# Altium PCB Audio-Switch-v2.0.PcbDoc (part 1 of 3)
Units mil, origin at the board's own origin, x right, y up, seen from the top; angles counter-clockwise.
Board outline 3937.01 x 3149.61 mil, 4 copper layers (Top Layer, Ground Layer, Power Layer, Bottom Layer), stack 60.4 mil thick; 165 components, 115 nets, 627 pads, 263 vias.
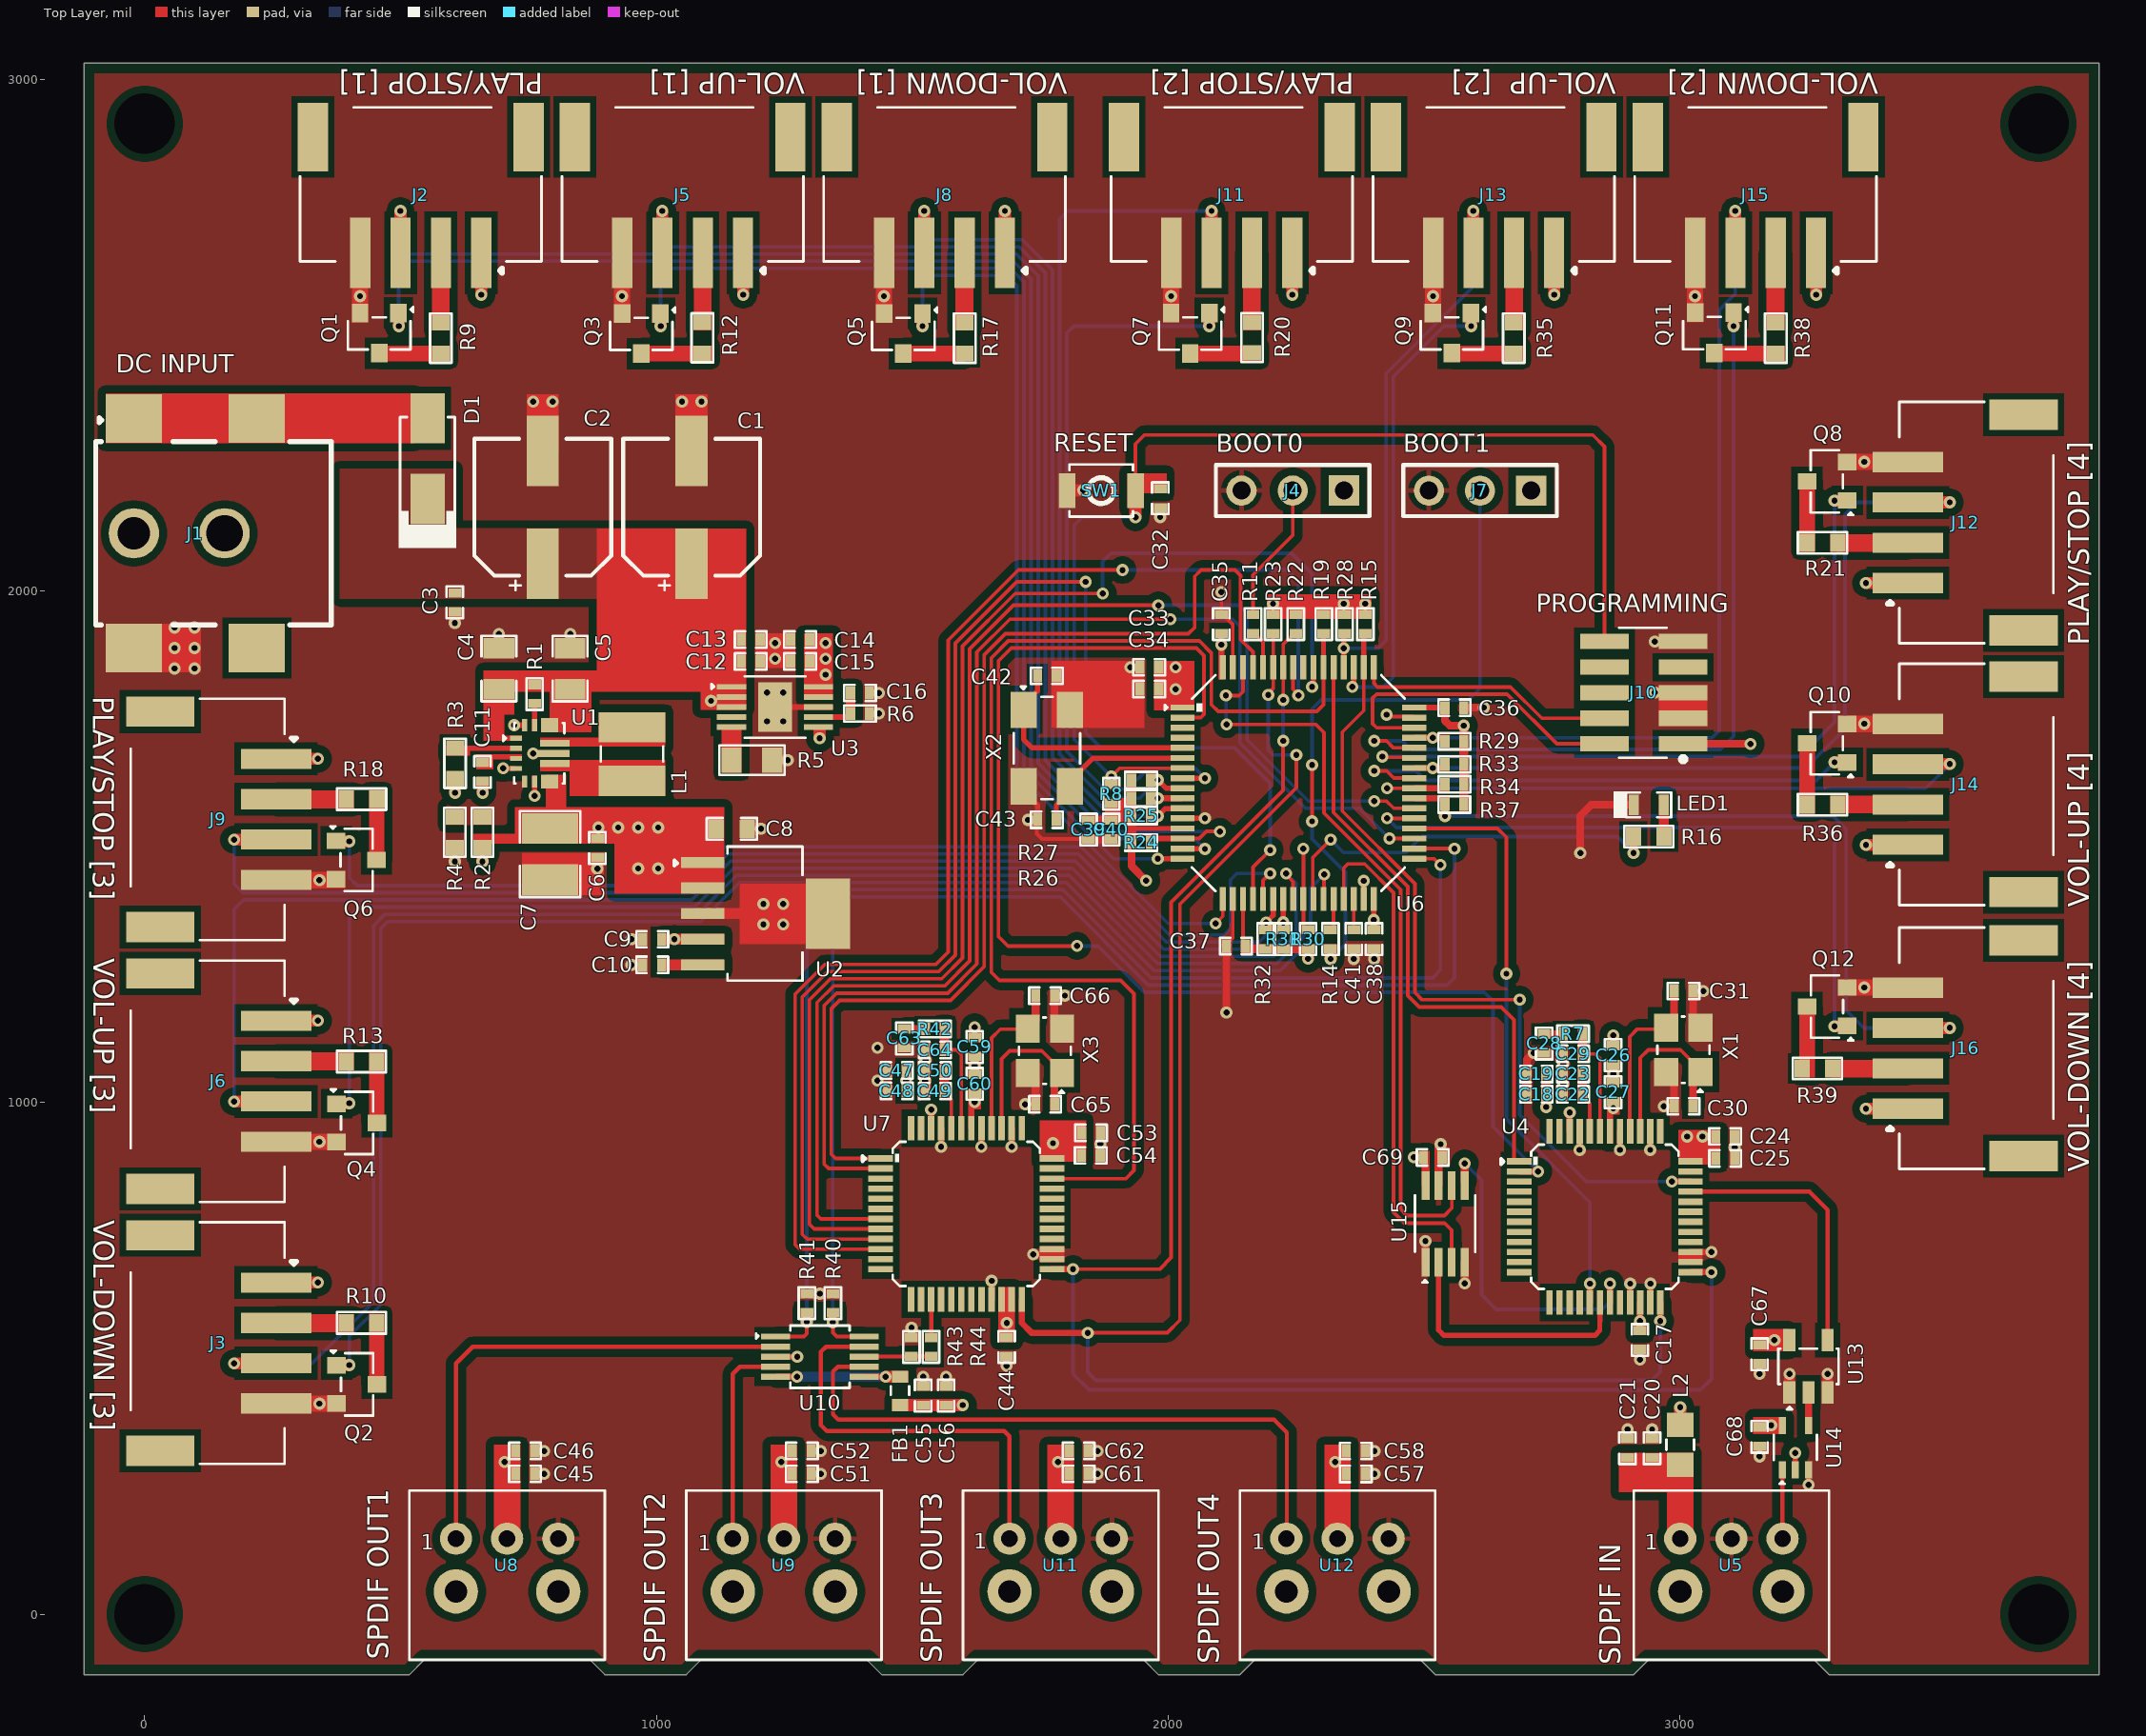
[diagram p0: Top Layer view]
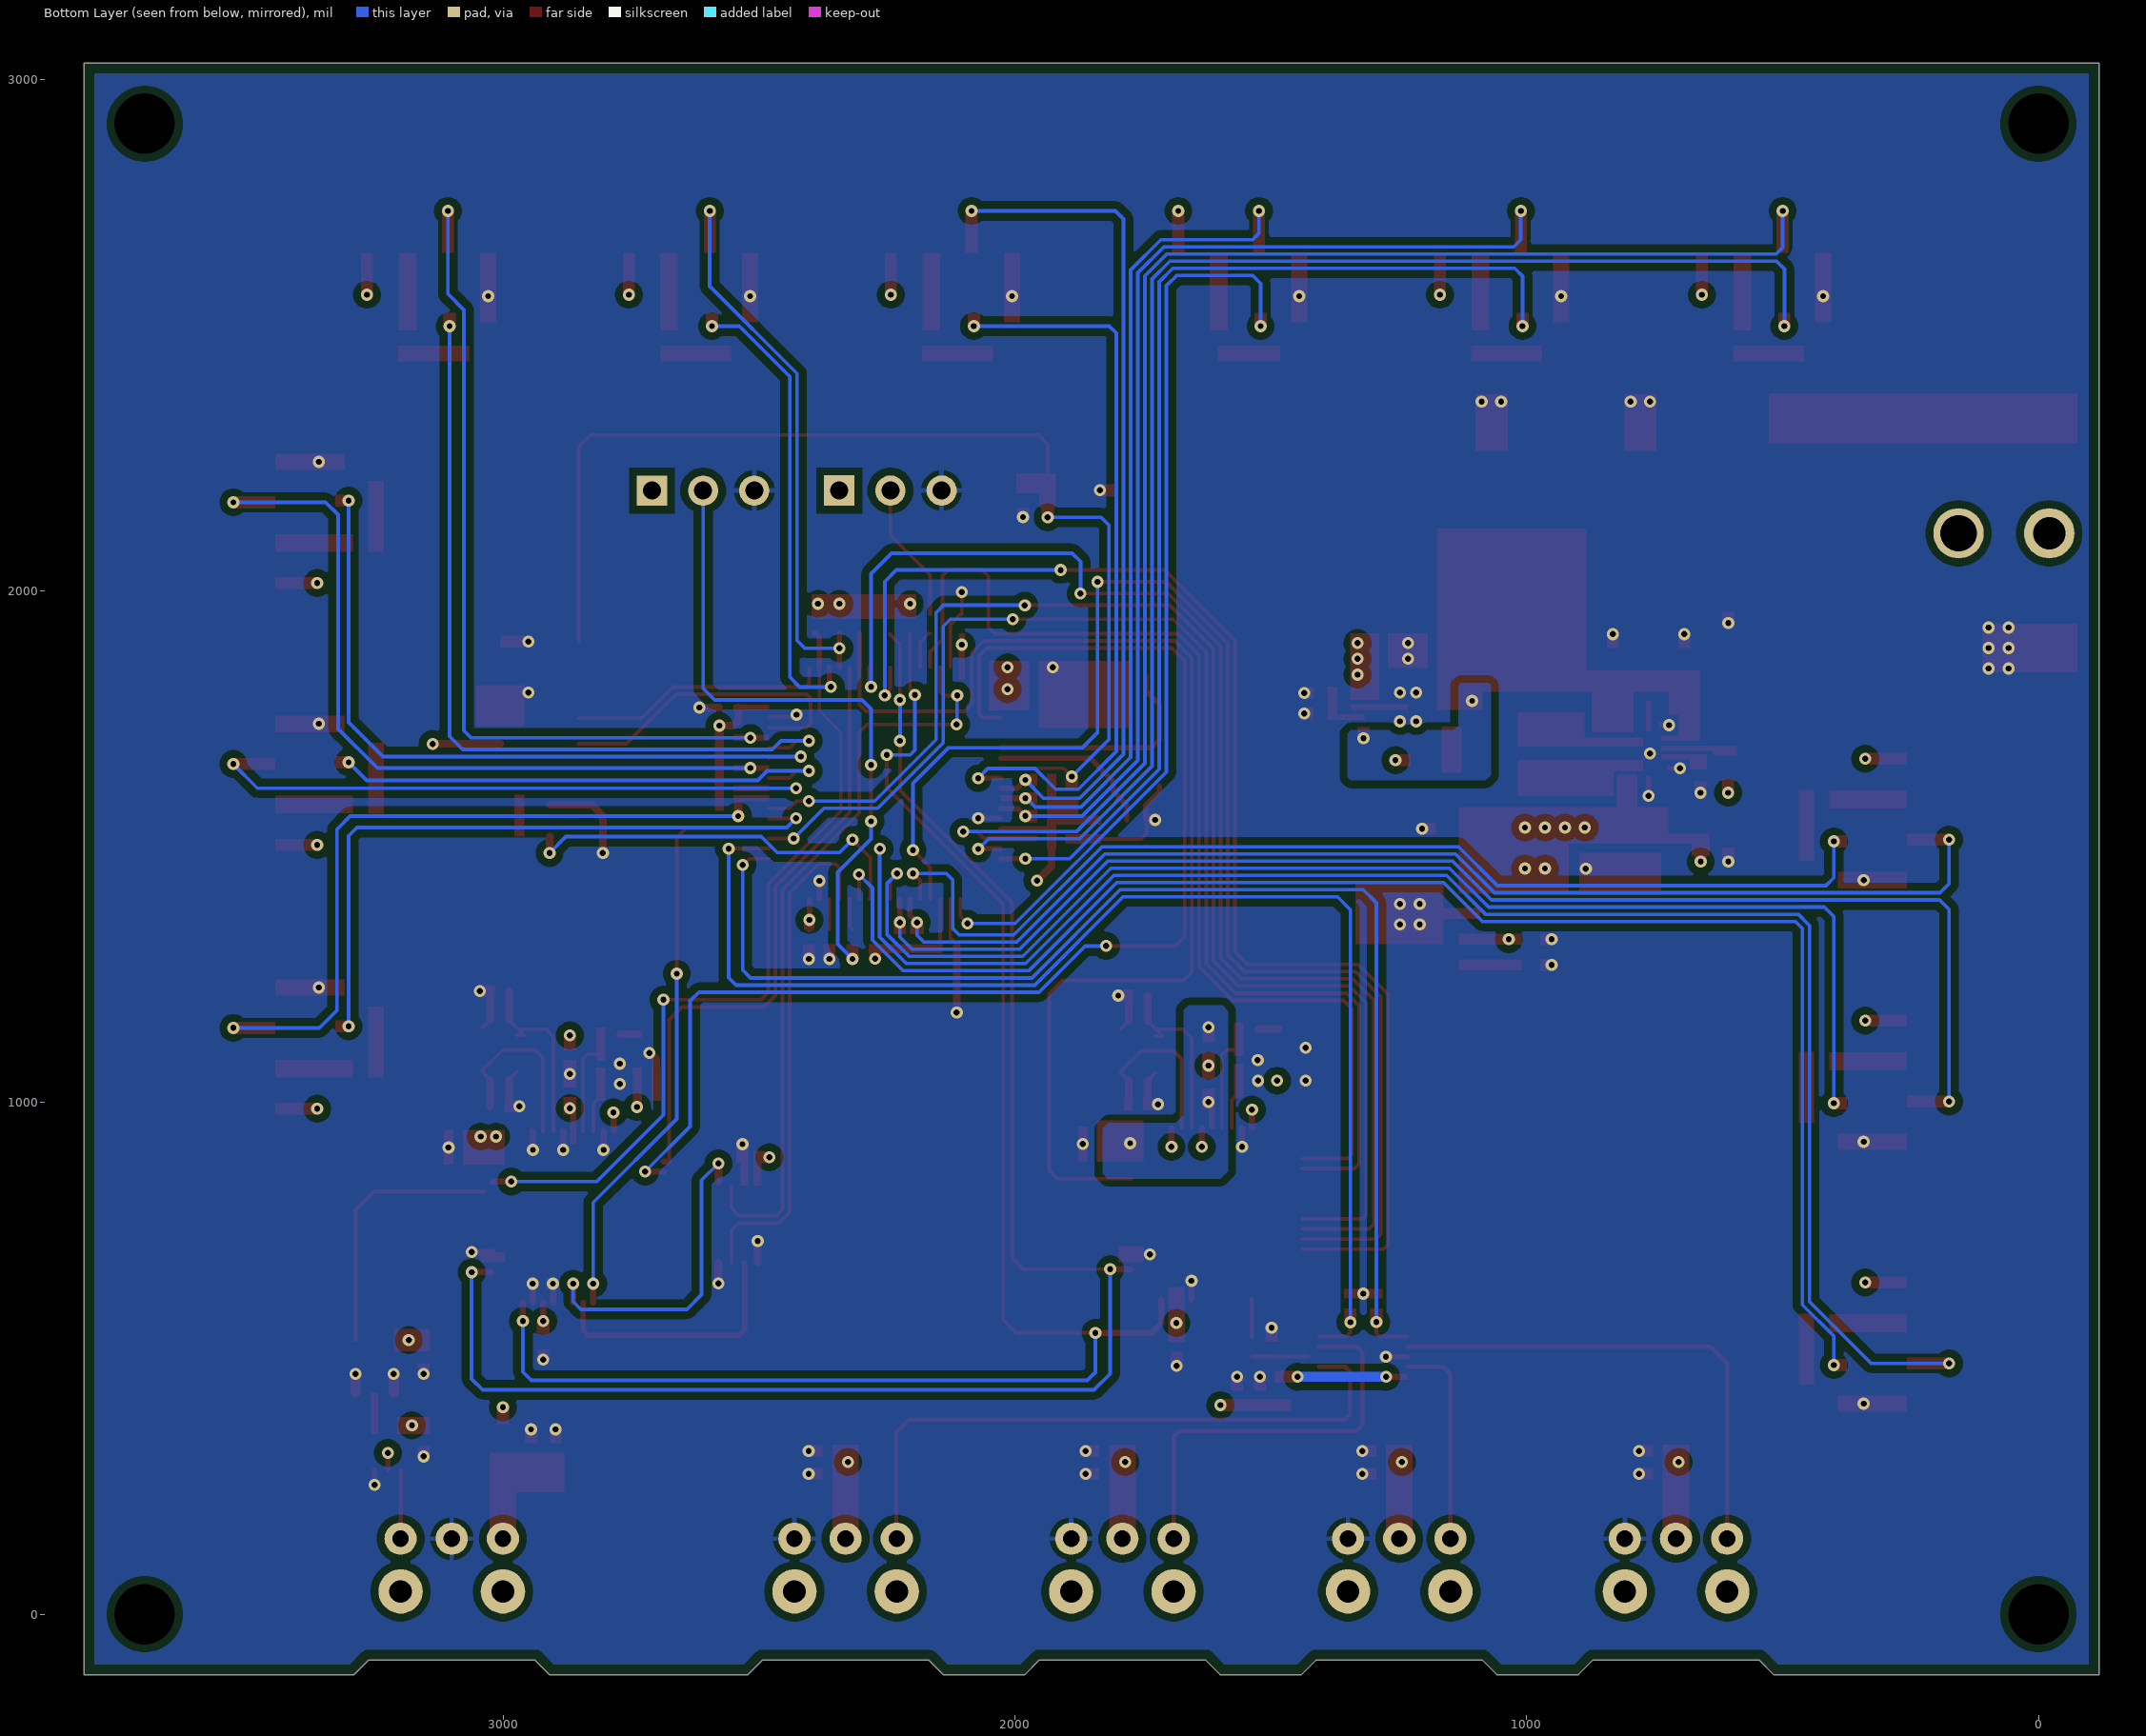
[diagram p1: Bottom Layer view, seen from below]
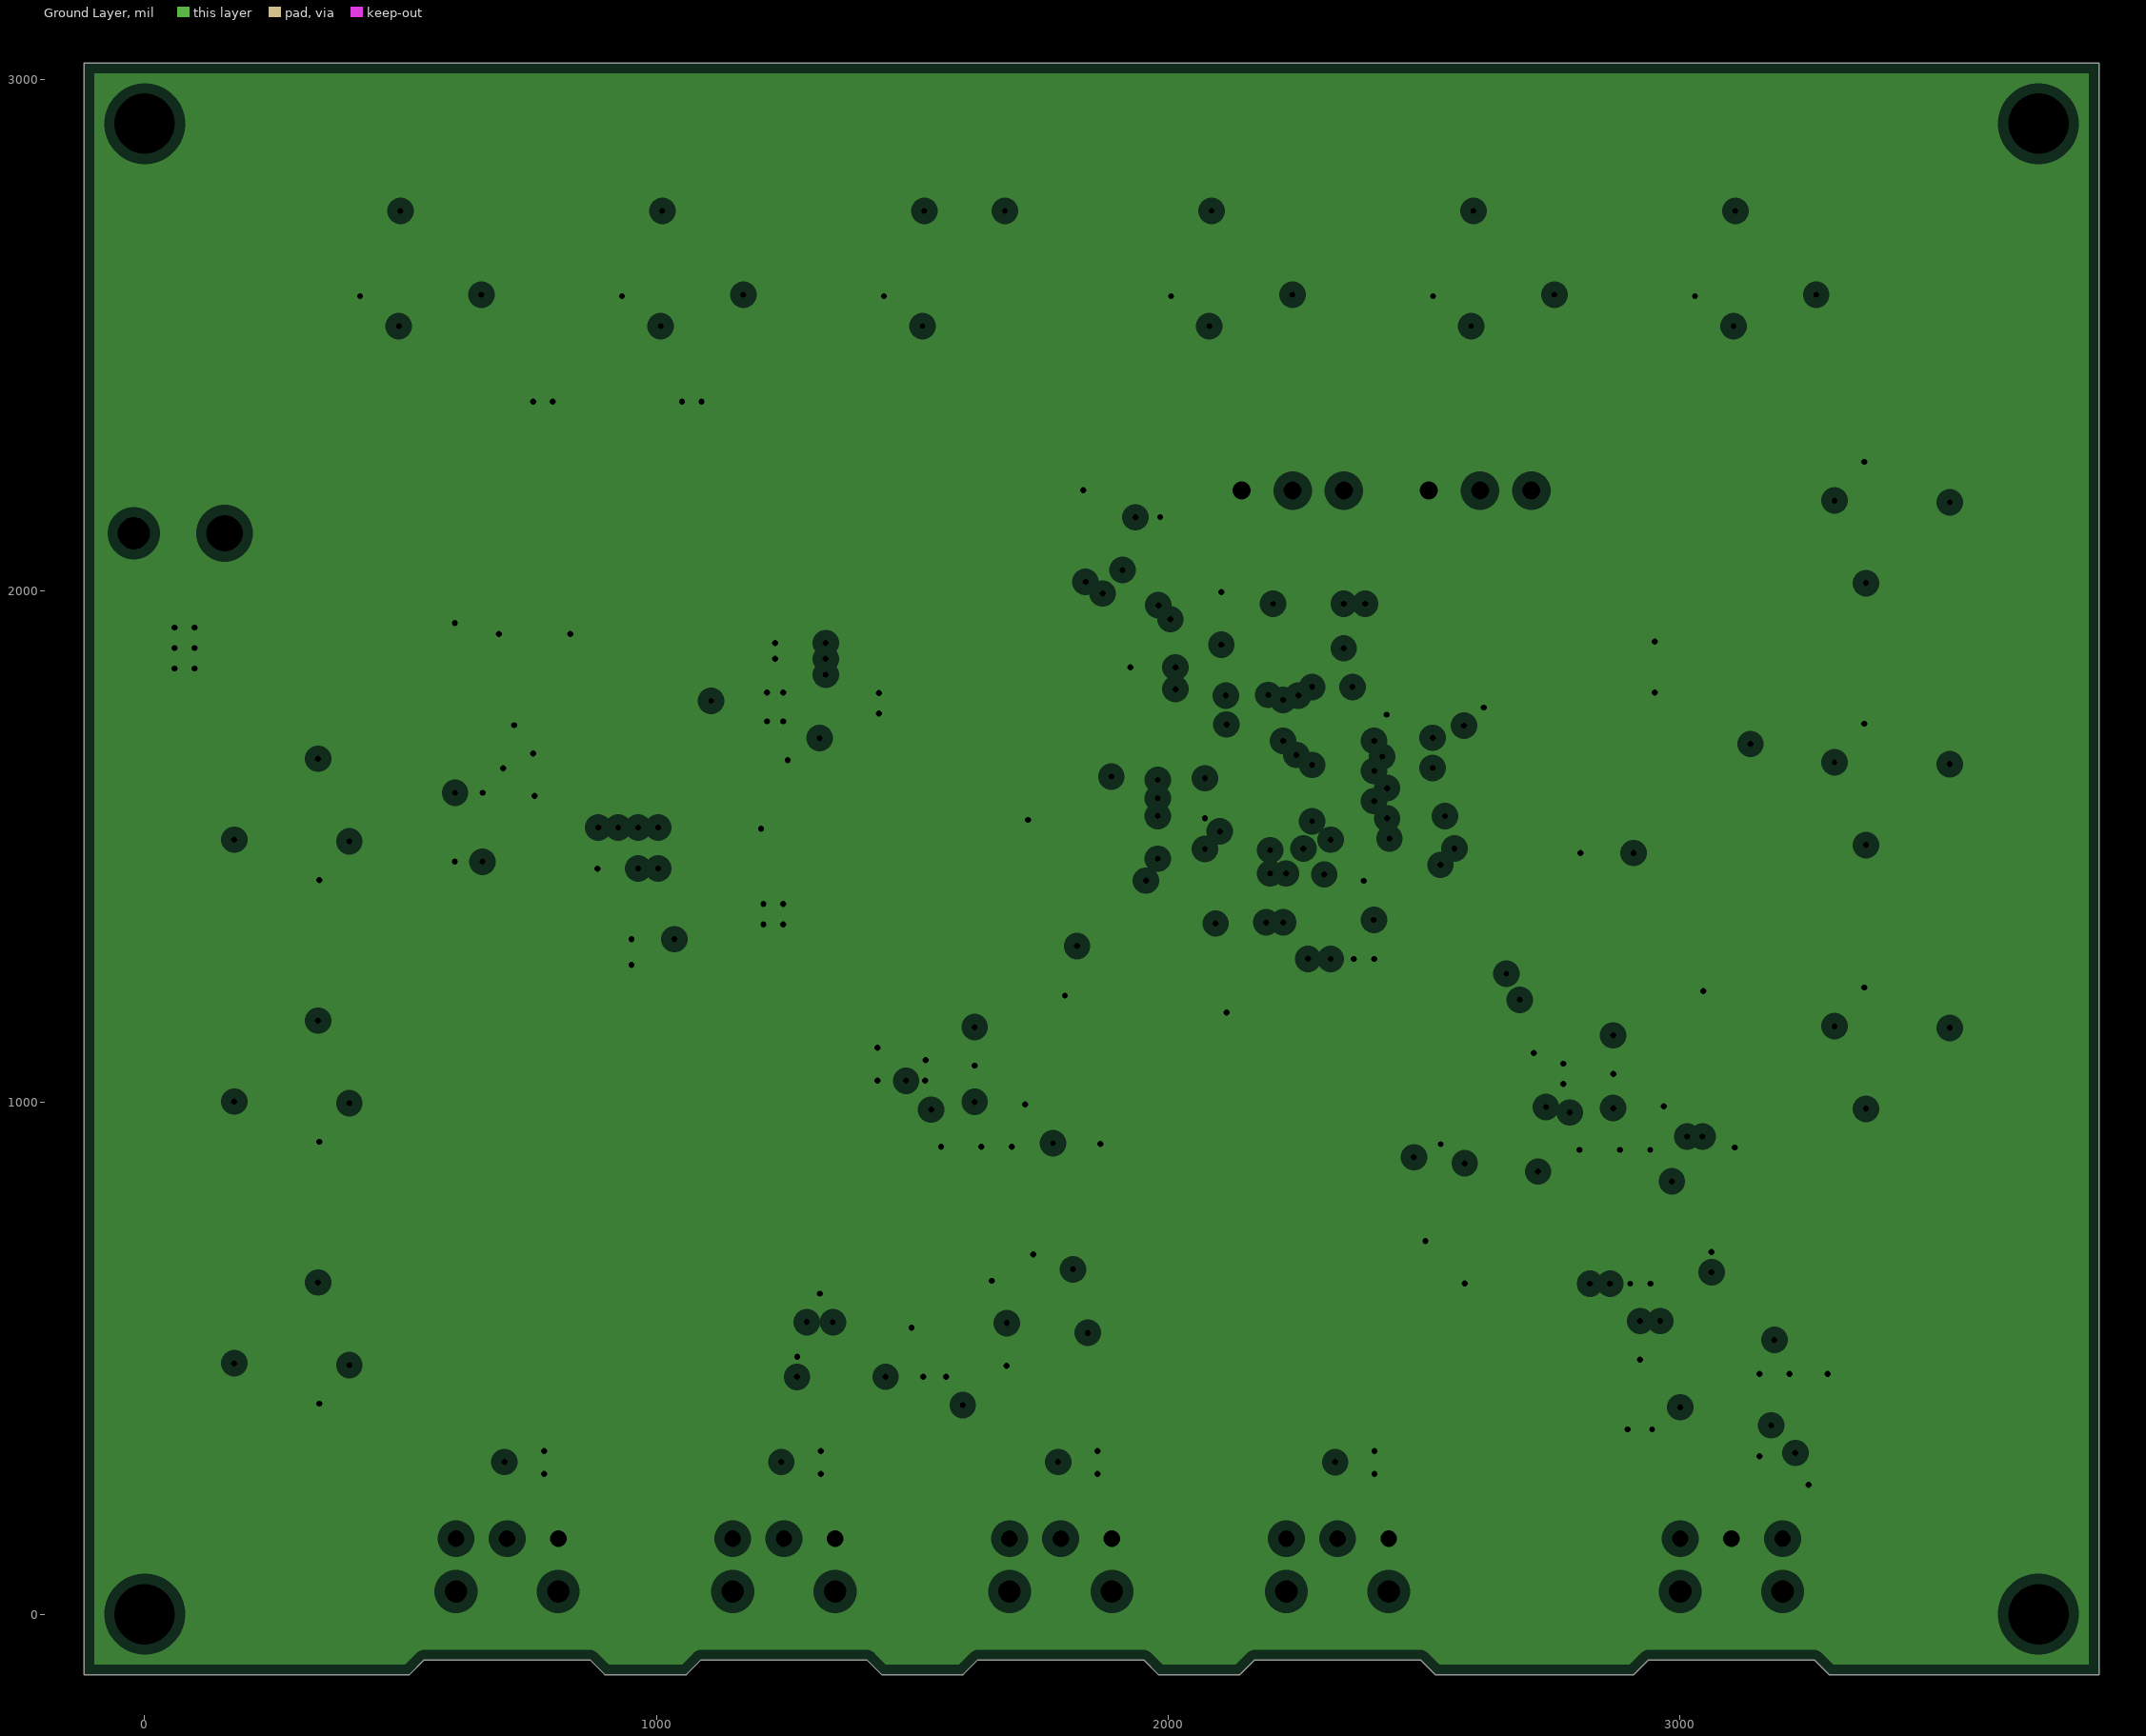
[diagram p2: Ground Layer, clearances drawn from the general rule]
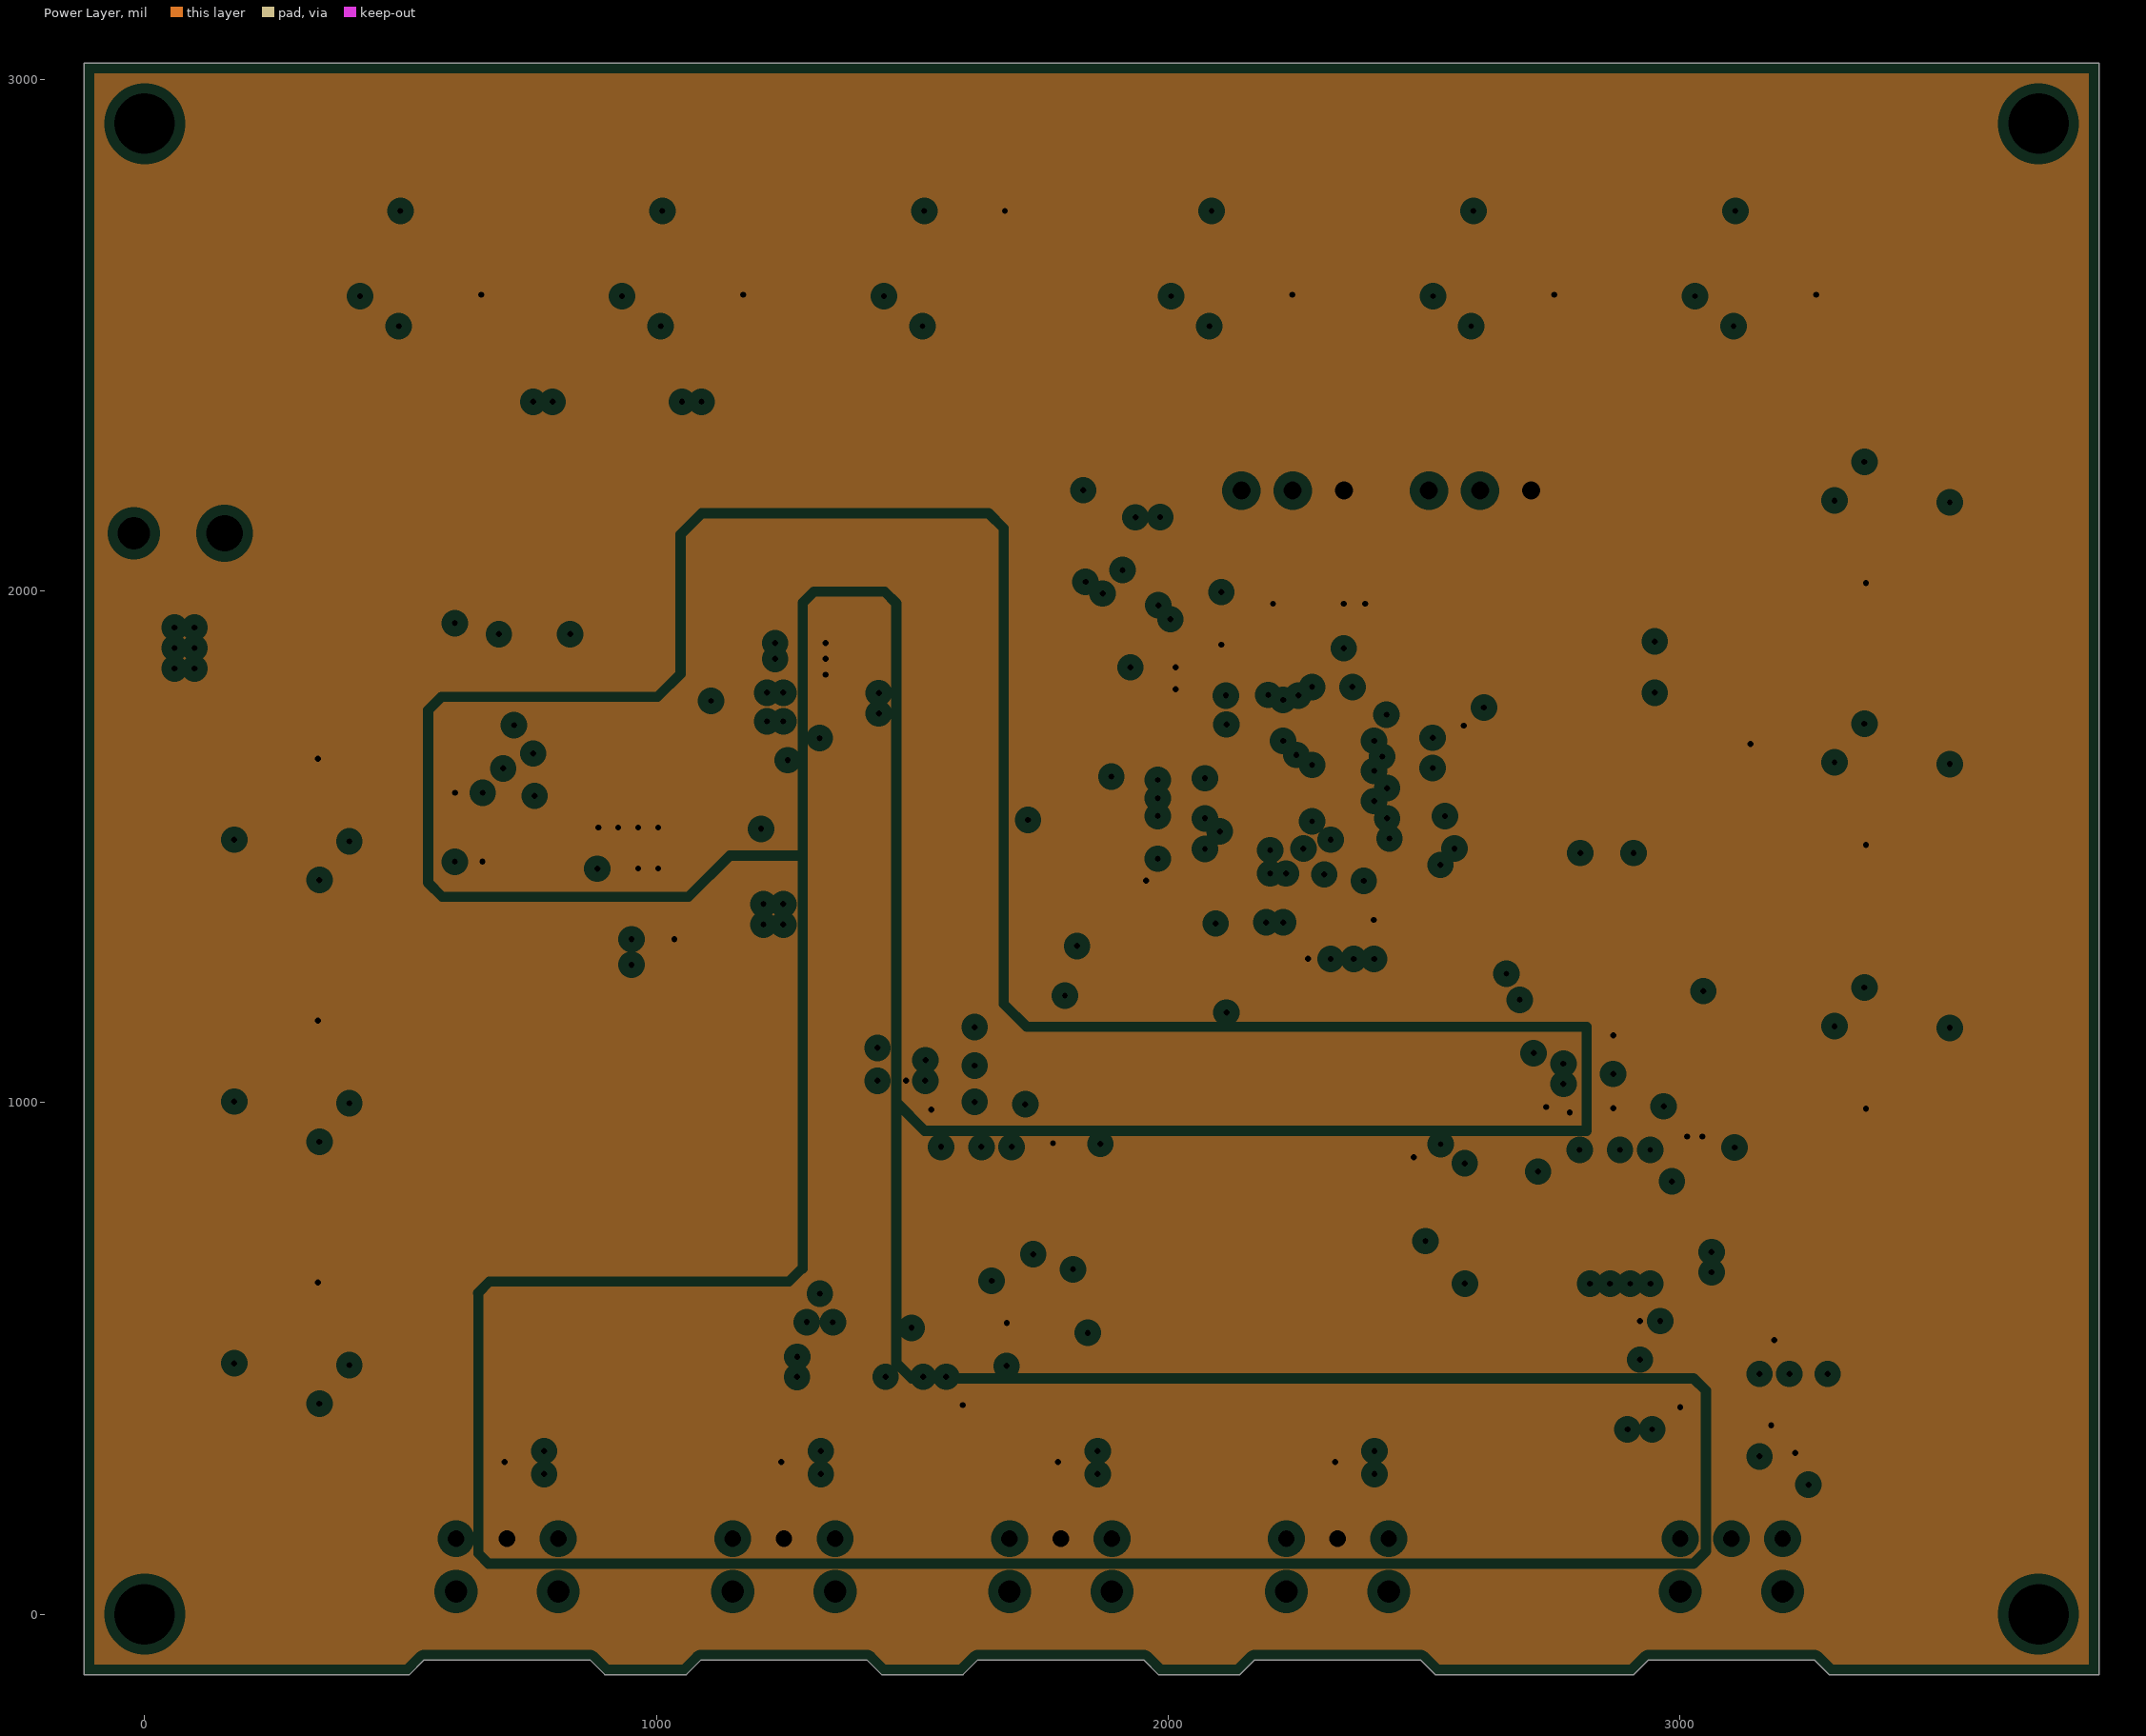
[diagram p3: Power Layer, clearances drawn from the general rule]
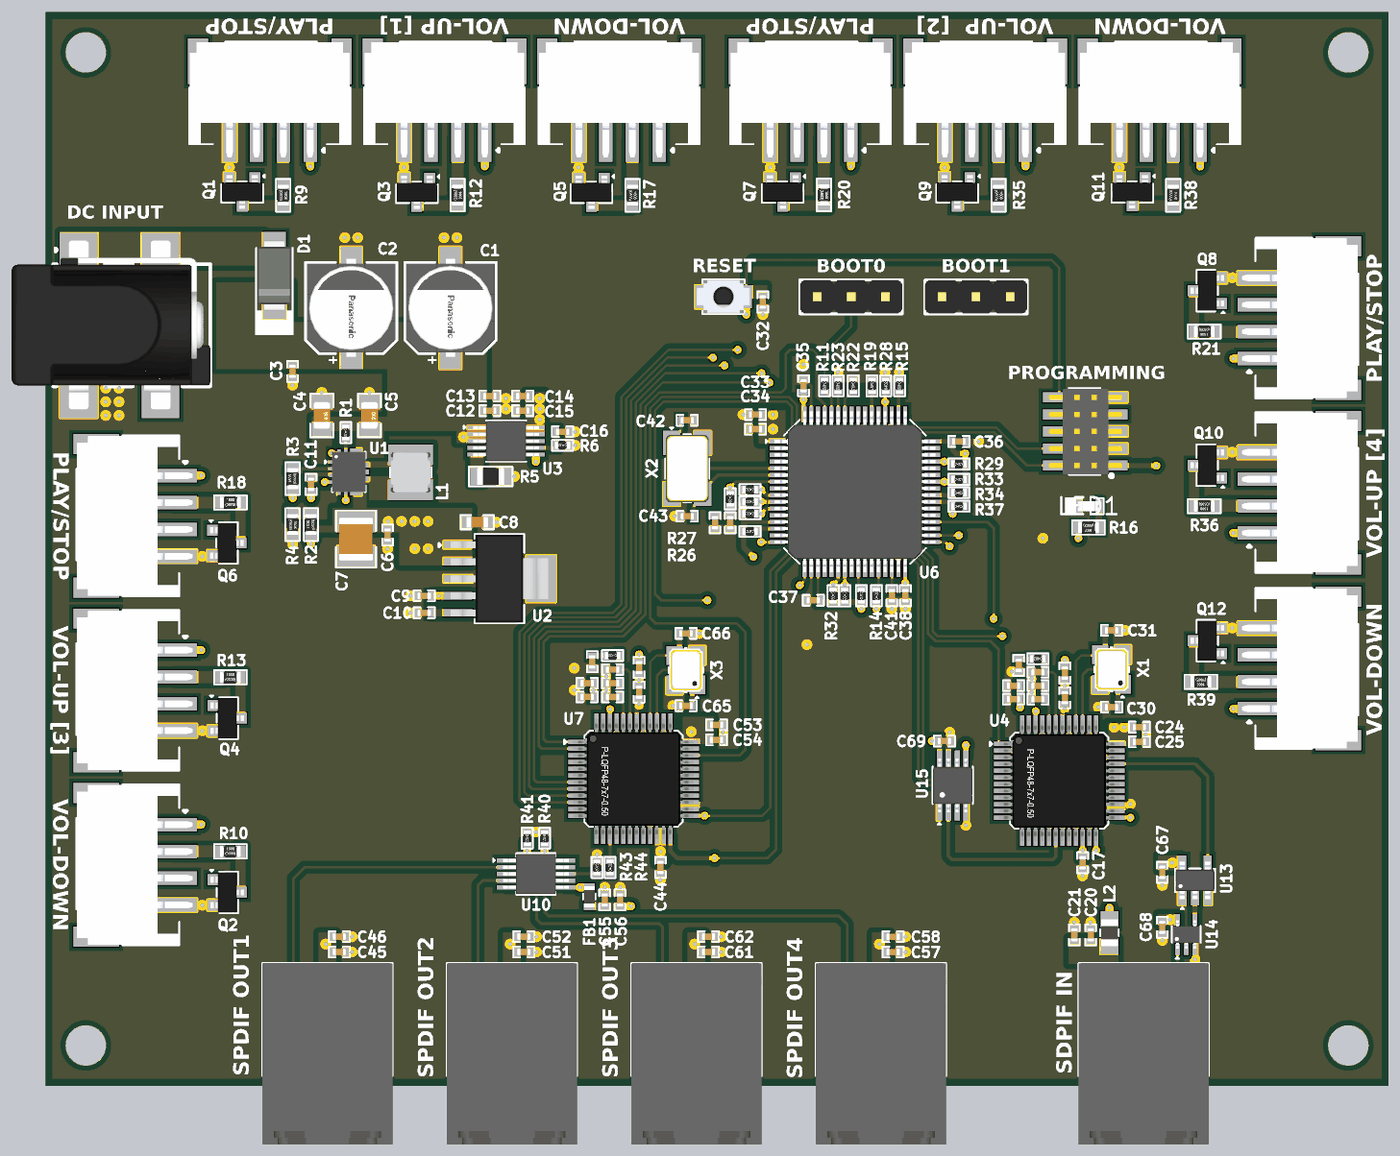
[diagram p5: 3D render of the assembled board from above, using the file's embedded part models]

## Layer stack, top to bottom
Top Solder: solder mask 0.4, Solder Resist, Dk 3.5
Top Layer: signal copper 1.38
Dielectric 2: prepreg 4.8, PP-006, Dk 4.2
Ground Layer: plane copper 1.38, net GND
Dielectric 1: dielectric 45.28, FR-4, Dk 4.2
Power Layer: plane copper 1.38, net (Multiple Nets)
Dielectric 3: prepreg 4.8, PP-006, Dk 4.2
Bottom Layer: signal copper 1.38
Bottom Solder: solder mask 0.4, Solder Resist, Dk 3.5

## Board outline
-118.11,-118.11 517.28,-118.11 517.44,-118.11 546.18,-89.38 870.28,-89.38 899.01,-118.11 1058.38,-118.11 1058.39,-118.12 1087.12,-89.38 1411.23,-89.38 1439.96,-118.12 1599.33,-118.12 1628.07,-89.38 1952.17,-89.38 1980.9,-118.11 2140.27,-118.11 2169.01,-89.38 2493.11,-89.38 2521.85,-118.11 2909.96,-118.11 2938.7,-89.38 3262.8,-89.38 3291.53,-118.11 3818.9,-118.11 3818.9,3031.5 -118.11,3031.5

## Design rules (kind name [scope] priority, off if disabled: settings)
BoardOutlineClearance [All] p1: gap=0 ignorepadtopadclearanceinfootprint=FALSE except(20: Poly-OutlineEdge)
Clearance [All] p1: gap=10 ignorepadtopadclearanceinfootprint=FALSE except(0: Arc-Hole Track-Hole SMDPad-Hole THPad-Hole Via-Hole Fill-Hole Poly-Hole Region-Hole Text-Hole; 5: Arc-SMDPad Track-SMDPad Track-Fill SMDPad-SMDPad SMDPad-Via SMDPad-Fill Via-Fill Fill-Fill; 7: Arc-Track Arc-Via Track-Track Track-Via THPad-Via Via-Via; 12: SMDPad-Poly; 15: Arc-Poly Track-Poly THPad-Poly Via-Poly Fill-Poly Poly-Poly)
HoleSize [All] p1: absolutevalues=TRUE maxlimit=157.48 minlimit=1 maxpercent=80.000 minpercent=20.000
MinimumSolderMaskSliver [All] p1: minsoldermaskwidth=0
PlaneClearance [All] p1: clearance=20
PlaneConnect [All] p1: planeconnectstyle=Direct reliefexpansion=20 reliefentries=4 reliefconductorwidth=10 reliefairgap=10
PolygonConnect [All] p1: thpad.connectstyle=Relief thpad.reliefconductorwidth=10 thpad.reliefentries=4 thpad.polygonreliefangle="90 Angle" thpad.airgapwidth=10 smdpad.connectstyle=Direct smdpad.reliefconductorwidth=10 smdpad.reliefentries=4 smdpad.polygonreliefangle="90 Angle" smdpad.airgapwidth=10 via.connectstyle=Direct via.reliefconductorwidth=10 via.reliefentries=4 via.polygonreliefangle="90 Angle" via.airgapwidth=10
RoutingVias [All] p1: holewidth=11.81 width=23.62 viastyle="Through Hole" minholewidth=11.81 minwidth=23.62 maxholewidth=11.81 maxwidth=23.62
SilkToSilkClearance [All] p1: silktosilkclearance=5
SilkToSolderMaskClearance [IsPad] p1: minsilkscreentomaskgap=0 clearancetoexposedcopper=TRUE
SolderMaskExpansion [All] p1: expansion=4 istentingtop=FALSE
Width "SPDIF TRACE" [InNetClass('SPDIF')] p1: maxlimit=8.28 minlimit=8.28 preferedwidth=8.28 impedanceprofiledriven=TRUE impedanceprofileid={E2A7A2EA-177D-466D-A185-9F03FA65F514} impedanceprofilevalue=50.000000 minimp=50.000000 maximp=50.000000 favimp=50.000000
Width [All] p2: maxlimit=20 minlimit=7 preferedwidth=15 minimp=50.000000 maximp=50.000000 favimp=50.000000
24 further rules are at their usual default settings.

## Classes and differential pairs
net class SPDIF: SPDIF-IN SPDIF-INN SPDIF-OUT SPDIF-OUT1 SPDIF-OUT2 SPDIF-OUT3 SPDIF-OUT4
component class U_SPDIF-to-I2S-Sheet: C17 C18 C19 C20 C21 C22 C23 C24 C25 C26 C27 C28 C29 C30 C31 C67 C68 C69 L2 R7 U4 U5 U13 U14 U15 X1
component class U_Power-Sheet: C1 C2 C3 C4 C5 C6 C7 C8 C9 C10 C11 C12 C13 C14 C15 C16 D1 J1 L1 R1 R2 R3 R4 R5 R6 U1 U2 U3
component class U_I2S-to-SPDIF-Sheet: C44 C45 C46 C47 C48 C49 C50 C51 C52 C53 C54 C55 C56 C57 C58 C59 C60 C61 C62 C63 C64 C65 C66 FB1 R40 R41 R42 R43 R44 U7 U8 U9 U10 U11 U12 X3
component class U_Controller-Sheet: C32 C33 C34 C35 C36 C37 C38 C39 C40 C41 C42 C43 J2 J3 J4 J5 J6 J7 J8 J9 J10 J11 J12 J13 J14 J15 J16 LED1 Q1 Q2 Q3 Q4 Q5 Q6 Q7 Q8 Q9 Q10 Q11 Q12 R8 R9 R10 R11 R12 R13 R14 R15 R16 R17 R18 R19 R20 R21 R22 R23 R24 R25 R26 R27 R28 R29 R30 R31 R32 R33 R34 R35 R36 R37 R38 R39 SW1 U6 X2

## Components (designator, comment, footprint, x,y, rotation, side; value= is the part's Value field where it differs from the comment)
C1 "47uF" 25SVPF47M 1068.83,2163.82 r90 top
C2 "47uF" 25SVPF47M 777.83,2163.82 r90 top
C3 "0.1uF" Cap-0402 606.02,1977.82 r90 top
C4 "22uF" Cap-0805 692.01,1848.43 r270 top
C5 "22uF" Cap-0805 831.51,1848.43 r270 top
C6 "10uF" Cap-0402 884.49,1497.64 r90 top
C7 "47uF" Cap-1210 792.09,1485.64 r270 top
C8 "2.2uF" CAP-0603 1147.29,1535.1 r180 top
C9 "1uF" Cap-0402 991.87,1319.34 r0 top
C10 "10nF" Cap-0402 991.87,1269.34 r0 top
C11 "0.1uF" Cap-0402 660.37,1646.3 r90 top
C12 "4.7uF" Cap-0402 1184.26,1862.34 r180 top
C13 "4.7uF" Cap-0402 1184.26,1905.17 r180 top
C14 "4.7uF" Cap-0402 1280.83,1905.16 r0 top
C15 "4.7uF" Cap-0402 1280.83,1862.34 r0 top
C16 "4.7uF" Cap-0402 1397.83,1800.53 r180 top
C17 "0.1uF" Cap-0402 2922,536 r90 top
C18 "10uF" Cap-0402 2719.6,1016.25 r0 top
C19 "0.1uF" Cap-0402 2719.6,1055.69 r0 top
C20 "10uF" Cap-0402 2945.75,324.4 r270 top
C21 "0.1uF" Cap-0402 2897.75,324.4 r270 top
C22 "10uF" Cap-0402 2791,1016.25 r0 top
C23 "0.1uF" Cap-0402 2791,1055.69 r0 top
C24 "10uF" Cap-0402 3088.5,934 r180 top
C25 "0.1uF" Cap-0402 3088.51,891 r180 top
C26 "10uF" Cap-0402 2869.74,1092.74 r90 top
C27 "0.1uF" Cap-0402 2869.74,1020.25 r270 top
C28 "68nF" Cap-0402 2734.6,1115.24 r270 top
C29 "4.7nF" Cap-0402 2791,1095.24 r180 top
C30 "18pF" Cap-0402 3007.1,992.75 r0 top
C31 "18pF" Cap-0402 3007.11,1218 r180 top
C32 "0.1uF" Cap-0402 1984.49,2181.25 r90 top
C33 "1uF" Cap-0402 1963.12,1850.82 r0 top
C34 "0.1uF" Cap-0402 1963.12,1808.2 r0 top
C35 "0.1uF" Cap-0402 2103.85,1935.45 r270 top
C36 "0.1uF" Cap-0402 2559.49,1772.08 r180 top
C37 "0.1uF" Cap-0402 2132.44,1306.09 r0 top
C38 "0.1uF" Cap-0402 2402.49,1319.45 r90 top
C39 "1uF" Cap-0402 1844.49,1533.68 r90 top
C40 "0.1uF" Cap-0402 1888.99,1533.68 r90 top
C41 "4.7uF" Cap-0402 2362.76,1319.46 r90 top
C42 "30pF" Cap-0402 1762.99,1834.03 r180 top
C43 "30pF" Cap-0402 1763,1552.69 r0 top
C44 "0.1uF" Cap-0402 1684.59,522.48 r90 top
C45 "0.1uF" Cap-0402 743.24,274.25 r180 top
C46 "10uF" Cap-0402 743.24,319.25 r180 top
C47 "10uF" Cap-0402 1469.69,1062.67 r0 top
C48 "0.1uF" Cap-0402 1469.69,1022.68 r0 top
C49 "10uF" Cap-0402 1544.18,1022.49 r0 top
C50 "0.1uF" Cap-0402 1544.2,1062.67 r0 top
C51 "0.1uF" Cap-0402 1284.18,274.24 r180 top
C52 "10uF" Cap-0402 1284.18,319.24 r180 top
C53 "10uF" Cap-0402 1849.21,940.8 r180 top
C54 "0.1uF" Cap-0402 1848.69,896.76 r180 top
C55 "0.1uF" Cap-0402 1521,427 r270 top
C56 "10uF" Cap-0402 1566,426.99 r270 top
C57 "0.1uF" Cap-0402 2366.5,274 r180 top
C58 "10uF" Cap-0402 2366.5,319 r180 top
C59 "10uF" Cap-0402 1621.84,1108.7 r90 top
C60 "0.1uF" Cap-0402 1621.84,1036.68 r270 top
C61 "0.1uF" Cap-0402 1825.13,274.25 r180 top
C62 "10uF" Cap-0402 1825.13,319.25 r180 top
C63 "68nF" Cap-0402 1484.41,1125.44 r270 top
C64 "4.7nF" Cap-0402 1544.2,1103 r180 top
C65 "18pF" Cap-0402 1759.5,996.75 r0 top
C66 "18pF" Cap-0402 1759.5,1209 r180 top
C67 "0.1uF" Cap-0402 3155.75,508.08 r90 top
C68 "0.1uF" Cap-0402 3155.75,346.74 r90 top
C69 "0.1uF" Cap-0402 2517,893 r180 top
D1 "SS16" SMA 552.57,2258.82 r90 top
FB1 "BLM18SG121TN1D" "IND-0603 (1608 Metric)" 1476,436.44 r90 top
J1 "DC-005-5A-2.5-SMT" DC-005-5A-2.5-SMT -21.17,2112.82 r0 top value=Custom
J2 "S4B-PH-SM4-TB(LF)(SN)" S4B-PH-SM4-TB(LF)(SN) 539.49,2774.19 r0 top
J3 "S4B-PH-SM4-TB(LF)(SN)" S4B-PH-SM4-TB(LF)(SN) 143.54,530 r90 top
J4 "X6511WV-03H-C60D30" HDR1X3_ 2343.49,2196.45 r180 top
J5 "S4B-PH-SM4-TB(LF)(SN)" S4B-PH-SM4-TB(LF)(SN) 1051.3,2774.19 r0 top
J6 "S4B-PH-SM4-TB(LF)(SN)" S4B-PH-SM4-TB(LF)(SN) 143.54,1041.81 r90 top
J7 "X6511WV-03H-C60D30" HDR1X3_ 2709.49,2196.25 r180 top
J8 "S4B-PH-SM4-TB(LF)(SN)" S4B-PH-SM4-TB(LF)(SN) 1563.11,2774.19 r0 top
J9 "S4B-PH-SM4-TB(LF)(SN)" S4B-PH-SM4-TB(LF)(SN) 143.54,1553.62 r90 top
J10 "20021121-00010C4LF" 20021121-00010C4LF_ 2929.49,1801.25 r90 top
J11 "S4B-PH-SM4-TB(LF)(SN)" S4B-PH-SM4-TB(LF)(SN) 2124.49,2774.19 r0 top
J12 "S4B-PH-SM4-TB(LF)(SN)" S4B-PH-SM4-TB(LF)(SN) 3558.75,2133.77 r270 top
J13 "S4B-PH-SM4-TB(LF)(SN)" S4B-PH-SM4-TB(LF)(SN) 2636.3,2774.19 r0 top
J14 "S4B-PH-SM4-TB(LF)(SN)" S4B-PH-SM4-TB(LF)(SN) 3558.75,1621.96 r270 top
J15 "S4B-PH-SM4-TB(LF)(SN)" S4B-PH-SM4-TB(LF)(SN) 3148.11,2774.19 r0 top
J16 "S4B-PH-SM4-TB(LF)(SN)" S4B-PH-SM4-TB(LF)(SN) 3558.75,1106.29 r270 top
L1 "1.5uH" LVT303012-1R5M-N 952.01,1681.34 r90 top
L2 "47uH" Ind-0805 3000.75,331.06 r270 top
LED1 "RED" LED-0603 2939.17,1581.93 r180 top
Q1 "DDTD113ZC-7-F" SOT-23 458.34,2504.19 r180 top
Q2 "DDTD113ZC-7-F" SOT-23 414.54,449.25 r270 top
Q3 "DDTD113ZC-7-F" SOT-23 970.49,2503.19 r180 top
Q4 "DDTD113ZC-7-F" SOT-23 414.54,960.25 r270 top
Q5 "DDTD113ZC-7-F" SOT-23 1482.49,2503.19 r180 top
Q6 "DDTD113ZC-7-F" SOT-23 413.54,1474.25 r270 top
Q7 "DDTD113ZC-7-F" SOT-23 2043.09,2503.82 r180 top
Q8 "DDTD113ZC-7-F" SOT-23 3287.75,2214.4 r90 top
Q9 "DDTD113ZC-7-F" SOT-23 2554.49,2504.19 r180 top
Q10 "DDTD113ZC-7-F" SOT-23 3287.75,1702.4 r90 top
Q11 "DDTD113ZC-7-F" SOT-23 3067.49,2504.56 r180 top
Q12 "DDTD113ZC-7-F" SOT-23 3288,1187.65 r90 top
R1 "10K" Res-0402 762.01,1798.43 r270 top
R2 "523K" Res-0603 660.01,1528.14 r270 top value=523kR
R3 "100K" Res-0603 606.49,1662.96 r270 top
R4 "100K" Res-0603 606.13,1528.15 r90 top
R5 "649R" RES-0805 1186.79,1669.34 r0 top
R6 "49.9K" Res-0402 1397.83,1760.65 r180 top value=49.9kR
R7 "680R" Res-0402 2791,1134.5 r180 top
R8 "10K" Res-0402 1888.99,1603.51 r270 top
R9 "100R" Res-0603 578.49,2494.19 r90 top
R10 "100R" Res-0603 423.54,569.37 r180 top
R11 "10K" Res-0402 2165.91,1935.45 r270 top
R12 "100R" Res-0603 1089.67,2494.82 r90 top
R13 "100R" Res-0603 423.54,1080.25 r180 top
R14 "10K" Res-0402 2317.48,1319.47 r90 top
R15 "10K" Res-0402 2385.44,1935.45 r270 top
R16 "220R" Res-0603 2939.17,1519.79 r0 top
R17 "100R" Res-0603 1602.49,2494.19 r90 top
R18 "100R" Res-0603 423.91,1592.99 r180 top
R19 "10K" Res-0402 2304.49,1935.45 r270 top
R20 "100R" Res-0603 2163.86,2495.45 r90 top
R21 "100R" Res-0603 3278.75,2094.4 r0 top
R22 "4.7K" Res-0402 2249.65,1935.45 r270 top
R23 "4.7K" Res-0402 2205.28,1935.45 r270 top
R24 "10K" Res-0402 1947.22,1508.18 r180 top
R25 "10K" Res-0402 1947.22,1560.16 r180 top
R26 "10K" Res-0402 1947.22,1595.01 r180 top
R27 "10K" Res-0402 1947.22,1630.6 r180 top
R28 "10K" Res-0402 2344.85,1935.45 r90 top
R29 "10K" Res-0402 2559.49,1706.12 r0 top
R30 "10K" Res-0402 2273.33,1319.46 r270 top
R31 "10K" Res-0402 2224.96,1319.46 r270 top
R32 "10K" Res-0402 2190.59,1319.47 r270 top
R33 "10K" Res-0402 2559.49,1660.97 r0 top
R34 "10K" Res-0402 2559.49,1622 r0 top
R35 "100R" Res-0603 2675.49,2494.19 r90 top
R36 "100R" Res-0603 3278.75,1582.4 r0 top
R37 "10K" Res-0402 2559.48,1582.42 r0 top
R38 "100R" Res-0603 3187.48,2494.19 r90 top
R39 "100R" Res-0603 3268.75,1066.92 r0 top
R40 "10K" Res-0402 1345,607.82 r270 top
R41 "10K" Res-0402 1294,608 r270 top
R42 "680R" Res-0402 1544.2,1143.94 r180 top
R43 "10K" Res-0402 1498.43,522.49 r270 top
R44 "33R" Res-0402 1536.7,522.49 r90 top
SW1 "B3U-1000P" B3U-1000P 1869.25,2196.25 r180 top
U1 "TPS63070RNMR" VQFN-15-HR(2.5x3) 763.49,1682.64 r0 top locked
U2 "TPS79633DCQR" SOT-223-6_ 1212.87,1369.34 r270 top
U3 "LT3042IMSE#PBF" 10-MSOP-EP 1231.83,1773.34 r0 top
U4 "PCM9211PTR" "48-LQFP (7x7)" 2853.6,776.75 r0 top
U5 "PLR237/T10BK" PLR237/T10BK 3100.75,95.97 r180 top
U6 "STM32F401RCT6" "64-LQFP (10x10)" 2254.49,1624.45 r0 top locked
U7 "PCM9211PTR" "48-LQFP (7x7)" 1605.7,782.49 r0 top
U8 "PLT133/T10W" PLT133/T10W 708.23,95.98 r180 top
U9 "PLT133/T10W" PLT133/T10W 1249.17,95.97 r180 top
U10 "TMUX1204DGSR" VSSOP-10 1319.49,503.29 r0 top
U11 "PLT133/T10W" PLT133/T10W 1790.12,95.98 r180 top
U12 "PLT133/T10W" PLT133/T10W 2331.06,95.97 r180 top
U13 "SN74LVC1G125DBVR" SOT-23-5 3251.34,484.4 r90 top
U14 "SN74LVC1G08DCKR" SC70-5 3225.75,325.4 r90 top
U15 "SN74LVC2G125DCTR" SM8 2541.25,762.6 r90 top
X1 "S3224576121060" S3224576121060_ 3007.1,1103.24 r90 top value=24.576MHz
X2 "8MHz" 5TJ480000XYLBC_ 1762.99,1693.03 r270 top
X3 "S3224576121060" S3224576121060_ 1759.19,1101.24 r90 top value=24.576MHz

## Footprints (in the part's own frame and the unit in brackets; to place one, negate y for a bottom-side part, rotate by r counter-clockwise, add the part's x,y. Pads: shape width x height; smd on the part's side, far side on the other; paste and mask are expansions set on the pad)
5TJ480000XYLBC_ [mm]
  rect 1.8x1.3 smd mask+0.07: 1(-1.9,-1.15) 2(1.9,-1.15) 3(1.9,1.15) 4(-1.9,1.15)
  silkscreen extent -3.05,-1.65 2.54,1.65, body extent -2.5,-1.6 2.5,1.6, height 1
10-MSOP-EP [mm]
  rect 1.45x0.28 smd mask+0.08: 1(-2.16,1) 2(-2.16,0.5) 3(-2.16,0) 4(-2.16,-0.5) 5(-2.16,-1) 6(2.16,-1) 7(2.16,-0.5) 8(2.16,0) 9(2.16,0.5) 10(2.16,1)
  rect 1.68x2.46 smd paste-2 mask+0.08: 11(0,0)
  silkscreen extent -3.15,-1.52 1.5,1.52, body extent -2.45,-1.5 2.45,1.5, height 1.07
25SVPF47M [mm]
  rect 3.5x1.6 smd: 1(-2.8,0) 2(2.8,0)
  silkscreen extent -4.11,-3.4 3.4,3.4, body extent -3.65,-3.3 3.65,3.3, height 6
"48-LQFP (7x7)" [mm]
  rect 1.22x0.32 smd: 1(-4.25,2.75) 2(-4.25,2.25) 3(-4.25,1.75) 4(-4.25,1.25) 5(-4.25,0.75) 6(-4.25,0.25) 7(-4.25,-0.25) 8(-4.25,-0.75) 9(-4.25,-1.25) 10(-4.25,-1.75) 11(-4.25,-2.25) 12(-4.25,-2.75) 25(4.25,-2.75) 26(4.25,-2.25) 27(4.25,-1.75) 28(4.25,-1.25) 29(4.25,-0.75) 30(4.25,-0.25) 31(4.25,0.25) 32(4.25,0.75) 33(4.25,1.25) 34(4.25,1.75) 35(4.25,2.25) 36(4.25,2.75)
  rect 0.32x1.22 smd: 13(-2.75,-4.25) 14(-2.25,-4.25) 15(-1.75,-4.25) 16(-1.25,-4.25) 17(-0.75,-4.25) 18(-0.25,-4.25) 19(0.25,-4.25) 20(0.75,-4.25) 21(1.25,-4.25) 22(1.75,-4.25) 23(2.25,-4.25) 24(2.75,-4.25) 37(2.75,4.25) 38(2.25,4.25) 39(1.75,4.25) 40(1.25,4.25) 41(0.75,4.25) 42(0.25,4.25) 43(-0.25,4.25) 44(-0.75,4.25) 45(-1.25,4.25) 46(-1.75,4.25) 47(-2.25,4.25) 48(-2.75,4.25)
  silkscreen extent -5.16,-3.58 3.66,3.58, body extent -4.51,-4.51 4.49,4.49, height 1.43
"64-LQFP (10x10)" [mm]
  rect 1.2x0.3 smd: 1(-5.75,3.75) 2(-5.75,3.25) 3(-5.75,2.75) 4(-5.75,2.25) 5(-5.75,1.75) 6(-5.75,1.25) 7(-5.75,0.75) 8(-5.75,0.25) 9(-5.75,-0.25) 10(-5.75,-0.75) 11(-5.75,-1.25) 12(-5.75,-1.75) 13(-5.75,-2.25) 14(-5.75,-2.75) 15(-5.75,-3.25) 16(-5.75,-3.75) 33(5.75,-3.75) 34(5.75,-3.25) 35(5.75,-2.75) 36(5.75,-2.25) 37(5.75,-1.75) 38(5.75,-1.25) 39(5.75,-0.75) 40(5.75,-0.25) 41(5.75,0.25) 42(5.75,0.75) 43(5.75,1.25) 44(5.75,1.75) 45(5.75,2.25) 46(5.75,2.75) 47(5.75,3.25) 48(5.75,3.75)
  rect 0.3x1.2 smd: 17(-3.75,-5.75) 18(-3.25,-5.75) 19(-2.75,-5.75) 20(-2.25,-5.75) 21(-1.75,-5.75) 22(-1.25,-5.75) 23(-0.75,-5.75) 24(-0.25,-5.75) 25(0.25,-5.75) 26(0.75,-5.75) 27(1.25,-5.75) 28(1.75,-5.75) 29(2.25,-5.75) 30(2.75,-5.75) 31(3.25,-5.75) 32(3.75,-5.75) 49(3.75,5.75) 50(3.25,5.75) 51(2.75,5.75) 52(2.25,5.75) 53(1.75,5.75) 54(1.25,5.75) 55(0.75,5.75) 56(0.25,5.75) 57(-0.25,5.75) 58(-0.75,5.75) 59(-1.25,5.75) 60(-1.75,5.75) 61(-2.25,5.75) 62(-2.75,5.75) 63(-3.25,5.75) 64(-3.75,5.75)
  silkscreen extent -6.63,-5.36 5.28,5.36, body extent -6,-6 6,6, height 1.6
20021121-00010C4LF_ [mm]
  rect 0.76x2.4 smd: 1(-2.54,-1.95) 2(-2.54,1.95) 3(-1.27,-1.95) 4(-1.27,1.95) 5(0,-1.95) 6(0,1.95) 7(1.27,-1.95) 8(1.27,1.95) 9(2.54,-1.95) 10(2.54,1.95)
  silkscreen extent -3.43,-2.08 3.23,1.22, body extent -3.17,-2.78 3.18,2.72, height 4.5
B3U-1000P [mm] "SWITCH TACTILE SPST-NO 0.05A 12V"
  rect 0.82x1.72 smd: 1(-1.7,0) 2(1.7,0)
  silkscreen extent -1.57,-1.3 1.57,1.3, body extent -2,-1.26 2,1.24, height 1.6
Cap-0402 [mil]
  rect 18x25 smd mask+2.36: 1(-18.5,0) 2(18.5,0)
  silkscreen extent -31,-16 31,16, body extent -20,-10 20,10, height 19
CAP-0603 [mil]
  rect 30x35 smd mask+2.36: 1(-30,0) 2(30,0)
  silkscreen extent -49,-21 49,21, body extent -32,-16 31,16, height 34
Cap-0805 [mil] "SMD 0805"
  rect 40x60 smd mask+2.76: 1(-40,0) 2(40,0)
  silkscreen extent -64,-34 64,34, body extent -39,-25 39,25, height 30
Cap-1210 [mil] "SMD 1210"
  rect 60x110 smd: 1(-50,0) 2(50,0)
  silkscreen extent -84,-59 84,59, body extent -63,-49 63,49, height 39
DC-005-5A-2.5-SMT [mm]
  rect 2.8x2.4 smd: 1(0,5.7) 1(6.1,5.7) 2(0,-5.7) 3(6.1,-5.7)
  round 2.5 hole 1.6 unplated: MH1(0,0)
  round 2.5 hole 1.8 unplated: MH2(4.5,0)
  silkscreen extent -1.89,-4.56 9.8,5.74, body extent -4.99,-6.27 9.81,6.33, height 11.17
HDR1X3_ [mm] "Connector; Header; 3 Position"
  rect 1.5x1.5 hole 0.9: 1(0,0)
  round 1.5 hole 0.9: 2(2.54,0) 3(5.08,0)
  silkscreen extent -1.27,-1.27 6.35,1.27, body extent -1.27,-1.24 6.35,1.25, height 8.54
"IND-0603 (1608 Metric)" [mm] "0.063\" L x 0.032\" W (1.60mm x 0.80mm)"
  rect 0.6x0.8 smd: 1(-0.7,0) 2(0.7,0)
  silkscreen extent -0.2,-0.46 0.23,0.46, body extent -0.8,-0.4 0.8,0.4, height 0.78
Ind-0805 [mm] "Inductor 0805"
  rect 1.2x1.32 smd: 1(-1,0) 2(1,0)
  silkscreen extent -0.25,-0.69 0.25,0.69, body extent -1,-0.62 1,0.63, height 0.47
LED-0603 [mm]
  rect 0.5x1 smd: 1(-0.75,0) 2(0.75,0)
  silkscreen extent -1.12,-0.66 1.75,0.66, body extent -0.82,-0.37 0.82,0.36, height 0.68
LVT303012-1R5M-N [mm]
  rect 1.5x3.32 smd paste+0 mask+0.051: 1(1.328,0) 2(-1.328,0)
  silkscreen extent -0.38,-1.55 0.38,1.55, body extent -1.51,-1.5 1.51,1.5, height 1.51
PLR237/T10BK [mm]
  round 1.6 hole 0.82: 1(2.54,-1.31) 2(0,-1.31) 3(-2.54,-1.31)
  round 2.2 hole 1.12: 4(2.54,1.31) 5(-2.54,1.31)
  silkscreen extent -4.85,-3.7 4.85,4.71, body extent -4.86,-3.7 4.85,9.8, height 10.05
PLT133/T10W [mm]
  round 1.6 hole 0.82: 1(2.54,-1.31) 2(0,-1.31) 3(-2.54,-1.31)
  round 2.2 hole 1.12: 4(2.54,1.31) 5(-2.54,1.31)
  silkscreen extent -4.85,-3.7 4.85,4.71, body extent -4.86,-3.7 4.85,9.8, height 10.05
Res-0402 [mil]
  rect 18x25 smd mask+2.17: 1(-18.5,0) 2(18.5,0)
  silkscreen extent -32,-17 32,16, body extent -23,-11 23,11, height 16
Res-0603 [mil]
  rect 30x35 smd: 1(-30,0) 2(30,0)
  silkscreen extent -48,-21 48,21, body extent -31,-17 31,17, height 18
RES-0805 [mil] "SMD 0805"
  rect 40x50 smd: 1(-40,0) 2(40,0)
  silkscreen extent -64,-29 64,29, body extent -39,-25 39,24, height 24
S4B-PH-SM4-TB(LF)(SN) [mm]
  rect 1x3.5 smd: 1(3,-2.875) 2(1,-2.875) 3(-1,-2.875) 4(-3,-2.875)
  rect 1.5x3.4 smd: P1(5.35,2.875) P2(-5.35,2.875)
  silkscreen extent -5.99,-3.89 5.99,4.34, body extent -5.95,-4.3 5.95,4.3, height 5.6
S3224576121060_ [mm] "24.576MHz SMD Crystal Resonator 12pF 60O ±10ppm -40?~+85? SMD3225-4P Crystals ROHS"
  rect 1.4x1.2 smd: 1(-1.1,-0.85) 2(1.1,-0.85) 3(1.1,0.85) 4(-1.1,0.85)
  silkscreen extent -2.1,-1.3 1.65,1.3, body extent -1.6,-1.25 1.6,1.25, height 0.82
SC70-5 [mm]
  rect 0.85x0.35 smd: 1(-1.1,0.65) 2(-1.1,0) 3(-1.1,-0.65) 4(1.1,-0.65) 5(1.1,0.65)
  silkscreen extent -1.8,-1.07 0.64,1.07, body extent -1.05,-1 1.05,1, height 1.1
SM8 [mm]
  rect 1.42x0.4 smd: 1(-1.9,0.975) 2(-1.9,0.325) 3(-1.9,-0.325) 4(-1.9,-0.975) 5(1.9,-0.975) 6(1.9,-0.325) 7(1.9,0.325) 8(1.9,0.975)
  silkscreen extent -2.91,-1.49 1.42,1.49, body extent -2,-1.47 2,1.47, height 1.3
SMA [mm]
  rect 2.5x1.7 smd: 1(-2,0) 2(2,0)
  silkscreen extent -4.44,-1.42 2.06,1.42, body extent -2.6,-1.3 2.6,1.3, height 2.4
SOT-23 [mm] "TRANS NPN 40V 0.6A SOT23"
  rect 0.82x0.92 smd: 1(-0.95,-1) 2(0.95,-1) 3(0,1)
  silkscreen extent -1.68,-1.3 1.55,0.81, body extent -1.5,-1.25 1.5,1.25, height 1.05
SOT-23-5 [mm]
  rect 1.1x0.6 smd: 1(-1.3,0.95) 2(-1.3,0) 3(-1.3,-0.95) 4(1.3,-0.95) 5(1.3,0.95)
  silkscreen extent -2.13,-1.5 0.88,1.5, body extent -1.4,-1.45 1.4,1.45, height 1.45
SOT-223-6_ [mm]
  rect 0.55x2.15 smd: 1(-2.54,-3.1) 2(-1.27,-3.1) 3(0,-3.1) 4(1.27,-3.1) 5(2.54,-3.1)
  rect 3.5x2.2 smd: 6(0,3.1)
  silkscreen extent -3.33,-4.51 3.33,1.84, body extent -3.27,-3.63 3.27,3.63, height 1.8
VQFN-15-HR(2.5x3) [mm]
  rect 0.6x0.25 smd: 1(-0.963,0.75) 2(-0.963,0.25) 3(-0.963,-0.25) 4(-0.963,-0.75)
  rect 0.25x0.6 smd: 5(-0.537,-1.4) 6(-0.038,-1.4) 14(-0.038,1.4) 15(-0.537,1.4)
  rect 0.85x0.7 smd: 7_8(0.713,-1.4) 12_13(0.713,1.4)
  rect 1.45x0.35 smd: 9(0.962,-0.5) 11(0.962,0.5)
  rect 1.8x0.35 smd: 10(0.787,0)
  silkscreen extent -1.6,-1.5 1.44,1.5, body extent -1.05,-1.5 1.45,1.5, height 1
VSSOP-10 [mm]
  rect 1.45x0.3 smd paste+0 mask+0.05: 1(-2.2,1) 2(-2.2,0.5) 3(-2.2,0) 4(-2.2,-0.5) 5(-2.2,-1) 6(2.2,-1) 7(2.2,-0.5) 8(2.2,0) 9(2.2,0.5) 10(2.2,1)
  silkscreen extent -3.17,-1.55 1.47,1.55, body extent -2.45,-1.5 2.45,1.5, height 1.07

## Part data
C1 C2: library part 25SVPF47M, "CAP ALUM POLY 47UF 20% 25V SMD", Capacitor Type=Aluminium, Case/Package=2626, ESR (Equivalent Series Resistance)=30mR, LCSC Part Number=C136280, Leakage Current=235uA, Manufacturer=Panasonic, Max Operating Temperature=105°C, Min Operating Temperature=-55°C, Package Shape=Cylindrical, Package Style=SMTMeter, Rated DC Voltage (URdc)=25V, Ripple Current=140mA, Tolerance  (fill in as +-)=20%, Category="Polymer Capacitors", ComponentLink1Description=https://datasheet.ciiva.com:443/pdfs/VipMasterIC/IC/PANA/PANA-S-A0008969958/PANA-S-A0008969958-1.pdf?src-supplier=IHS+Markit, ComponentLink1URL=https://datasheet.ciiva.com:443/pdfs/VipMasterIC/IC/PANA/PANA-S-A0008969958/PANA-S-A0008969958-1.pdf?src-supplier=IHS+Markit, ComponentLink2Description=https://datasheet.ciiva.com/48542/svpf-eng-ds-48542390.pdf?src-supplier=Distrelec, ComponentLink2URL=https://datasheet.ciiva.com/48542/svpf-eng-ds-48542390.pdf?src-supplier=Distrelec, ComponentLink3Description=https://datasheet.ciiva.com/25746/1734360-25746558.pdf?src-supplier=Farnell, ComponentLink3URL=https://datasheet.ciiva.com/25746/1734360-25746558.pdf?src-supplier=Farnell, ComponentLink4Description=https://datasheet.ciiva.com/22746/1734360-22746218.pdf?src-supplier=Element14, ComponentLink4URL=https://datasheet.ciiva.com/22746/1734360-22746218.pdf?src-supplier=Element14, ComponentLink5Description=https://datasheet.ciiva.com/24025/svpf-os-262415-24025725.pdf?src-supplier=Mouser, ComponentLink5URL=https://datasheet.ciiva.com/24025/svpf-os-262415-24025725.pdf?src-supplier=Mouser, Dielectric Material=Aluminium, Height=5.9mm, Item Type=Capacitor, Length=7.3mm, Manufacturer Part Number=25SVPF47M, Mounting Technology="Surface Mount", Packaging="Tape and Reel", Pins=2, Polarity=Polarized, Pricing 1="1000=0.43572, 2000=0.42658, 4000=0.41744, 6000=0.40830, 8000=0.39916 (USD)", Reach SVHC Compliant=Yes, RoHS=Yes, RoHS Compliant=Yes, Stock 1=1000, Supplier 1=Avnet, Supplier Part Number 1=25SVPF47M, Tan Delta=0.12, Termination=Flat, Tolerance (fill in as +-)=20%, Width=6.6mm
C3 C11 C17 C19 C21 C23 C25 C27 C32 C34 C35 C36 C37 C38 C40 C44 C45 C48 C50 C51 C54 C55 C57 C60 C61 C67 C68 C69: library part CC0402KRX7R8BB104, "CAP CER 0.1UF 25V X7R 0402", Capacitance=100nF, Case Code (Imperial)=0402, Case Code (Metric)=1005, Dielectric=X7R, LCSC Part Number=C105883, Manufacturer=Yageo, Max Operating Temperature=125°C, Min Operating Temperature=-55°C, Resistor Type=Ceramic, Supplier Part Number 1=311-2077-1-ND, Tolerance=10%, Voltage Rating=25V, Case/Package=0402, Category="Ceramic Capacitors", ComponentLink1Description=https://datasheet.ciiva.com/11464/upy-gphc-x7r-6-3v-to-50v-8-11464889.pdf?src-supplier=Avnet, ComponentLink1URL=https://datasheet.ciiva.com/11464/upy-gphc-x7r-6-3v-to-50v-8-11464889.pdf?src-supplier=Avnet, ComponentLink2Description=https://datasheet.ciiva.com/13210/upy-gphc-x7r-6-3v-to-50v-8-12304-13210908.pdf?src-supplier=Mouser, ComponentLink2URL=https://datasheet.ciiva.com/13210/upy-gphc-x7r-6-3v-to-50v-8-12304-13210908.pdf?src-supplier=Mouser, ComponentLink3Description=https://datasheet.ciiva.com/17437/upy-gphc-x7r-6-3v-to-50v-8-17437357.pdf?src-supplier=Avnet+Europe, ComponentLink3URL=https://datasheet.ciiva.com/17437/upy-gphc-x7r-6-3v-to-50v-8-17437357.pdf?src-supplier=Avnet+Europe, Depth=0.5mm, Dissipation Factor=3.5%, Halogen Free="Halogen Free", Height=0.5mm, Lead Free="Lead Free", Length=1mm, Manufacturer Part Number=CC0402KRX7R8BB104, Mount="Surface Mount", Packaging="Tape and Reel", Pricing 1="1=0.10000, 10=0.03100, 50=0.01700, 100=0.01390, 500=0.00990, 1000=0.00777, 2500=0.00707, 5000=0.00650 (USD)", Radiation Hardening=No, RoHS=Yes, Stock 1=1841009, Supplier 1=Digi-Key, Termination=SMD/SMT, Thickness=0.022inch, Voltage Rating (DC)=25V, Width=0.02inch
C4 C5: library part CL21A226MAYNNNE, "CAP CER 22UF 25V X5R 0805", LCSC Part Number=C602037, Manufacturer=Samsung, Supplier Part Number 1=187-CL21A226MAYNNNE, Category="Ceramic Capacitors", Manufacturer Part Number=CL21A226MAYNNNE, Pricing 1="1=0.28000, 10=0.18500, 50=0.18500, 100=0.10600, 500=0.07500, 1000=0.06400, 2000=0.06100, 10000=0.05400, 24000=0.05100, 50000=0.04600 (USD)", RoHS=Yes, RoHS Compliant=Yes, Stock 1=1240410, Supplier 1=Mouser
C6 C18 C20 C22 C24 C26 C46 C47 C49 C52 C53 C56 C58 C59 C62: library part CL05A106MP5NUNC, "CAP CER 10UF 10V X5R 0402", Case Code (Imperial)=0402, Case Code (Metric)=1005, Dielectric=X5R, LCSC Part Number=C315248, Manufacturer=Samsung, Max Operating Temperature=85°C, Min Operating Temperature=-55°C, Package Quantity=1, Tolerance=20%, Voltage Rating=10V, Capacitance=10uF, Case/Package=0402, Category="Ceramic Capacitors", ComponentLink1Description=https://datasheet.ciiva.com/25721/cl05a106mp5nunc-25721584.pdf?src-supplier=Digi-Key, ComponentLink1URL=https://datasheet.ciiva.com/25721/cl05a106mp5nunc-25721584.pdf?src-supplier=Digi-Key, ComponentLink2Description=https://datasheet.ciiva.com/26838/getdatasheetpartid-745310-26838170.pdf?src-supplier=Verical, ComponentLink2URL=https://datasheet.ciiva.com/26838/getdatasheetpartid-745310-26838170.pdf?src-supplier=Verical, Construction=Flat, Contact Plating=Tin, Depth=0.5mm, Item Type=Capacitor, Lead Free="Lead Free", Length=1mm, Manufacturer Part Number=CL05A106MP5NUNC, Mount="Surface Mount", Packaging="Tape and Reel", Pricing 1="10000=0.02537 (USD)", Radiation Hardening=No, RoHS=Yes, RoHS Compliant=Yes, Series=CL, Stock 1=1729850, Supplier 1=Avnet, Supplier Part Number 1=CL05A106MP5NUNC, Termination=Wraparound, Thickness=0.028inch, Width=0.02inch
C7: library part TMK325ABJ476MM-P, "CAP CER 47uF 25V 1210", Case/Package=Ceramic, Dielectric=X5R, LCSC Part Number=C90142, Manufacturer="Taiyo Yuden", Max Operating Temperature=85°C, Min Operating Temperature=-55°C, Supplier Part Number 1=1782936, Tolerance=20%, Capacitance=47uF, Category="Ceramic Capacitors", ComponentLink1Description=http://www.yuden.co.jp/productdata/catalog/en/mlcc_all_e.pdf?src-supplier=Avnet+Asia, ComponentLink1URL=http://www.yuden.co.jp/productdata/catalog/en/mlcc_all_e.pdf?src-supplier=Avnet+Asia, ComponentLink2Description=http://ds.yuden.co.jp/TYCOMPAS/ut/detail.do?productNo=TMK325ABJ476MM-P&fileName=TMK325ABJ476MM-P_SS&mode=specSheetDownload&src-supplier=Digi-Key, ComponentLink2URL=http://ds.yuden.co.jp/TYCOMPAS/ut/detail.do?productNo=TMK325ABJ476MM-P&fileName=TMK325ABJ476MM-P_SS&mode=specSheetDownload&src-supplier=Digi-Key, ComponentLink3Description="https://ds.yuden.co.jp/TYCOMPAS/ut/detail?pn=TMK325ABJ476MM-P &amp;u=M&src-supplier=Digi-Key", ComponentLink3URL="https://ds.yuden.co.jp/TYCOMPAS/ut/detail?pn=TMK325ABJ476MM-P &amp;u=M&src-supplier=Digi-Key", Contact Plating=Tin, Lead Free="Lead Free", Length=3.2mm, Manufacturer Part Number=TMK325ABJ476MM-P, Mount="Surface Mount", Packaging="Tape and Reel", Pricing 1="1000=0.37500 (GBP)", RoHS=Yes, RoHS Compliant=Yes, Stock 1=1000, Supplier 1=RSComponents, Termination=Wraparound
C8: library part CC0603KRX5R8BB225, "CAP CER 2.2UF 25V X5R 0603", Case Code (Imperial)=0603, Case Code (Metric)=1608, Dielectric=X5R, LCSC Part Number=C309478, Manufacturer=Yageo, Max Operating Temperature=85°C, Min Operating Temperature=-55°C, Package Quantity=4000, Resistor Type=Ceramic, Supplier Part Number 1=311-1786-1-ND, Tolerance=10%, Voltage Rating=25V, Capacitance=2.2uF, Case/Package=0603, ComponentLink1Description=https://www.verical.com/server-webapp/html/getDatasheet?partID=782757&src-supplier=Verical, ComponentLink1URL=https://www.verical.com/server-webapp/html/getDatasheet?partID=782757&src-supplier=Verical, Depth=0.8mm, Halogen Free="Halogen Free", Item Type=Capacitor, Lead Free="Lead Free", Length=1.6mm, Manufacturer Part Number=CC0603KRX5R8BB225, Mount="Surface Mount", Packaging="Tape and Reel", Pricing 1="1=0.4, 10=0.276, 50=0.1932, 100=0.1656, 500=0.1242, 1000=0.10488 (USD)", Radiation Hardening=No, RoHS Compliant=Yes, Stock 1=687936, Supplier 1=Digi-Key, Termination=SMD/SMT, Thickness=0.037inch, Voltage Rating (DC)=25V, Weight=7.1E-05oz, Width=0.031inch
C9 C33 C39: library part CC0402KRX5R7BB105, "CAP CER 1UF 16V X5R 0402", Case Code (Imperial)=0402, Case Code (Metric)=1005, Dielectric=X5R, LCSC Part Number=C325464, Manufacturer=Yageo, Max Operating Temperature=85°C, Min Operating Temperature=-55°C, Supplier Part Number 1=311-1691-6-ND, Tolerance=10%, Voltage Rating=16V, Capacitance=1uF, Case/Package=0402, ComponentLink1Description=http://www.yageo.com/documents/recent/UPY-GPHC_X5R_4V-to-50V_12.pdf?src-supplier=Avnet+Europe, ComponentLink1URL=http://www.yageo.com/documents/recent/UPY-GPHC_X5R_4V-to-50V_12.pdf?src-supplier=Avnet+Europe, Composition=Ceramic, Depth=0.5mm, Halogen Free="Halogen Free", Height=0.5mm, Item Type=Capacitor, Lead Free="Lead Free", Length=1mm, Manufacturer Part Number=CC0402KRX5R7BB105, Mount="Surface Mount", Packaging="Tape and Reel", Pricing 1="1=0.36, 10=0.252, 100=0.1512, 500=0.1134, 1000=0.09576, 2500=0.09072, 5000=0.08568 (USD)", Radiation Hardening=No, Stock 1=1405667, Supplier 1=Digi-Key, Termination=SMD/SMT, Thickness=0.022inch, Voltage Rating (DC)=16V, Weight=2.3E-05oz, Width=0.02inch
C10: library part CC0402KRX7R8BB103, "CAP CER 10000PF 25V X7R 0402", Case Code (Imperial)=0402, Case Code (Metric)=1005, Dielectric=X7R, LCSC Part Number=C327025, Manufacturer=Yageo, Max Operating Temperature=125°C, Min Operating Temperature=-55°C, Package Quantity=1, Supplier Part Number 1=311-1337-1-ND, Tolerance=10%, Voltage Rating=25V, Capacitance=10nF, Case/Package=0402, ComponentLink1Description=http://www.yageo.com/documents/recent/UPY-GPHC_X7R_6.3V-to-50V_18.pdf?src-supplier=Digi-Key, ComponentLink1URL=http://www.yageo.com/documents/recent/UPY-GPHC_X7R_6.3V-to-50V_18.pdf?src-supplier=Digi-Key, ComponentLink2Description=https://www.verical.com/server-webapp/html/getDatasheet?partID=375418&src-supplier=Verical, ComponentLink2URL=https://www.verical.com/server-webapp/html/getDatasheet?partID=375418&src-supplier=Verical, ComponentLink3Description=http://www.yageo.com/documents/recent/UPY-GPHC_X7R_6.3V-to-50V_8.pdf?src-supplier=Avnet, ComponentLink3URL=http://www.yageo.com/documents/recent/UPY-GPHC_X7R_6.3V-to-50V_8.pdf?src-supplier=Avnet, ComponentLink4Description=https://4donline.ihs.com/images/VipMasterIC/IC/YAGO/YAGO-S-A0003557223/YAGO-S-A0003557223-1.pdf?hkey=52A5661711E402568146F3353EA87419&src-supplier=Element14, ComponentLink4URL=https://4donline.ihs.com/images/VipMasterIC/IC/YAGO/YAGO-S-A0003557223/YAGO-S-A0003557223-1.pdf?hkey=52A5661711E402568146F3353EA87419&src-supplier=Element14, ComponentLink5Description=http://www.farnell.com/datasheets/2167236.pdf?src-supplier=Element14, ComponentLink5URL=http://www.farnell.com/datasheets/2167236.pdf?src-supplier=Element14, ComponentLink6Description=http://www.mouser.com/ds/2/447/Yageo_UPY-GP_NP0_16V-to-50V_9-358835.pdf?src-supplier=Mouser, ComponentLink6URL=http://www.mouser.com/ds/2/447/Yageo_UPY-GP_NP0_16V-to-50V_9-358835.pdf?src-supplier=Mouser, Composition=Ceramic, Depth=0.5mm, Halogen Free="Halogen Free", Height=0.5mm, Item Type=Capacitor, Lead Free="Lead Free", Length=1mm, Manufacturer Part Number=CC0402KRX7R8BB103, Mount="Surface Mount", Packaging="Tape and Reel", Pricing 1="1=0.1, 10=0.021, 100=0.0093, 500=0.00666, 1000=0.00523, 2500=0.00476, 5000=0.00438 (USD)", Radiation Hardening=No, REACH SVHC=Unknown, Stock 1=0, Supplier 1=Digi-Key, Termination=SMD/SMT, Thickness=0.022inch, Voltage Rating (DC)=25V, Width=0.02inch
C12 C13 C14 C15 C16 C41: library part CL05A475MO5NUNC, "CAP CER 4.7UF 16V X5R 0402", Case Code (Imperial)=0402, Case Code (Metric)=1005, Manufacturer=Samsung, Max Operating Temperature=85°C, Min Operating Temperature=-55°C, Tolerance=20%, Voltage Rating=16V, Capacitance=4.7uF, Case/Package=0402, Category="Ceramic Capacitors", ComponentLink1Description=http://www.farnell.com/datasheets/2710653.pdf?src-supplier=Farnell, ComponentLink1URL=http://www.farnell.com/datasheets/2710653.pdf?src-supplier=Farnell, ComponentLink2Description=http://www.samsungsem.com/kr/support/product-search/mlcc/CL05A475MO5NUNC.jsp?src-supplier=Digikey, ComponentLink2URL=http://www.samsungsem.com/kr/support/product-search/mlcc/CL05A475MO5NUNC.jsp?src-supplier=Digikey, ComponentLink3Description=http://www.farnell.com/datasheets/2710653.pdf?src-supplier=Element14, ComponentLink3URL=http://www.farnell.com/datasheets/2710653.pdf?src-supplier=Element14, ComponentLink4Description=https://datasheet.octopart.com/CL05A475MO5NUNC-Samsung-Electro-Mechanics-datasheet-123102911.pdf?src-supplier=Future+Electronics, ComponentLink4URL=https://datasheet.octopart.com/CL05A475MO5NUNC-Samsung-Electro-Mechanics-datasheet-123102911.pdf?src-supplier=Future+Electronics, ComponentLink5Description=http://www.farnell.com/datasheets/2710653.pdf?src-supplier=Newark, ComponentLink5URL=http://www.farnell.com/datasheets/2710653.pdf?src-supplier=Newark, Height=550um, Length=0.039inch, Manufacturer Part Number=CL05A475MO5NUNC, Material=4241ConductorMaterial, Mount="Surface Mount", Packaging="Cut Tape", Pricing 1="10000=0.09712 (USD)", RoHS=Yes, RoHS Compliant=Yes, Series=CL, Stock 1=50000, Supplier 1=Avnet, Supplier Part Number 1=CL05A475MO5NUNC, Thickness=0.022inch, Voltage Rating (DC)=16V, Width=0.02inch
C28 C63: library part CC0402KRX7R9BB683, "CAP CER 0.068UF 50V X7R 0402", Case/Package=343Case, Dielectric=1511DielectricType, Manufacturer=Yageo, Supplier Part Number 1=2106471, Voltage Rating (DC)=50V, Capacitance=68nF, Category="Ceramic Capacitors", Halogen Free=5694HalogenFree, Item Type=Capacitor, Lead Free=5697LeadFree, Manufacturer Part Number=CC0402KRX7R9BB683, Pricing 1="10000=0.0035, 40000=0.0033, 100000=0.0032, 250000=0.0031, 400000=0.0029 (USD)", RoHS=Yes, Stock 1=100000, Supplier 1="Future Electronics"
C29 C64: library part CC0402KRX7R9BB472, "CAP CER 4700PF 50V X7R 0402", Case Code (Imperial)=0402, Case Code (Metric)=1005, Dielectric=X7R, Manufacturer=Yageo, Max Operating Temperature=125°C, Min Operating Temperature=-55°C, Package Quantity=1, Supplier Part Number 1=1989300, Temperature Coefficient=30ppm/°C, Tolerance=10%, Voltage Rating=50V, Capacitance=4.7nF, Case/Package=0402, Category="Ceramic Capacitors", ComponentLink1Description=https://datasheet.ciiva.com/7978/1489800-7978108.pdf?src-supplier=Element14, ComponentLink1URL=https://datasheet.ciiva.com/7978/1489800-7978108.pdf?src-supplier=Element14, ComponentLink2Description=https://datasheet.ciiva.com/176/mlccorderingcode-176364.pdf?src-supplier=Digikey, ComponentLink2URL=https://datasheet.ciiva.com/176/mlccorderingcode-176364.pdf?src-supplier=Digikey, ComponentLink3Description=https://datasheet.ciiva.com/176/mlccorderingcode-176363.pdf?src-supplier=Digikey, ComponentLink3URL=https://datasheet.ciiva.com/176/mlccorderingcode-176363.pdf?src-supplier=Digikey, ComponentLink4Description=https://datasheet.ciiva.com/176/mlccorderingcode-176365.pdf?src-supplier=Digikey, ComponentLink4URL=https://datasheet.ciiva.com/176/mlccorderingcode-176365.pdf?src-supplier=Digikey, ComponentLink5Description=https://datasheet.ciiva.com/11586/upy-gphc-x7r-6-3v-to-50v-8-11586491.pdf?src-supplier=Avnet, ComponentLink5URL=https://datasheet.ciiva.com/11586/upy-gphc-x7r-6-3v-to-50v-8-11586491.pdf?src-supplier=Avnet, Construction=Flat, Depth=0.5mm, Halogen Free=5694HalogenFree, Height=0.5mm, Item Type=Capacitor, Lead Free=5697LeadFree, Length=1mm, Manufacturer Part Number=CC0402KRX7R9BB472, Material=4241ConductorMaterial, Mount="Surface Mount", Number of Pins=2NUMBER, Packaging="Tape and Reel", Pricing 1="10000=0.0021, 40000=0.002, 150000=0.0019, 400000=0.0018, 1000000=0.0017 (USD)", Radiation Hardening=No, Reach SVHC Compliant=No, RoHS=Yes, RoHS Compliant=Yes, Series=CC, Stock 1=1780000, Supplier 1="Future Electronics", Termination=SMD/SMT, Thickness=0.022inch, Voltage Rating (DC)=50V, Width=0.02inch
C30 C31 C65 C66: library part GCM1555C1H180GA16D, "CAP CER 18PF 50V C0G/NP0 0402", Case Code (Imperial)=0402, Case Code (Metric)=1005, LCSC Part Number=C882583, Manufacturer=Murata, Max Operating Temperature=125°C, Min Operating Temperature=-55°C, Ratings=AEC-Q200, Supplier Part Number=2477793P, Tolerance=2%, Voltage Rating=50V, Case/Package=0402, Category="Ceramic Capacitors", ComponentLink1Description=http://search.murata.co.jp/Ceramy/image/img/A01X/G101/ENG/GCM1555C1H180GA16-01.pdf?src-supplier=Digi-Key, ComponentLink1URL=http://search.murata.co.jp/Ceramy/image/img/A01X/G101/ENG/GCM1555C1H180GA16-01.pdf?src-supplier=Digi-Key, ComponentLink2Description=https://search.murata.co.jp/Ceramy/image/img/A01X/G101/ENG/GCM1555C1H180GA16-01.pdf?src-supplier=Digi-Key, ComponentLink2URL=https://search.murata.co.jp/Ceramy/image/img/A01X/G101/ENG/GCM1555C1H180GA16-01.pdf?src-supplier=Digi-Key, ComponentLink3Description=https://datasheet.octopart.com/GCM1555C1H180GA16D-Murata-datasheet-149522315.pdf?src-supplier=Newark, ComponentLink3URL=https://datasheet.octopart.com/GCM1555C1H180GA16D-Murata-datasheet-149522315.pdf?src-supplier=Newark, ComponentLink4Description=https://datasheet.octopart.com/GCM1555C1H180GA16D-Murata-datasheet-12511495.pdf?src-supplier=TME, ComponentLink4URL=https://datasheet.octopart.com/GCM1555C1H180GA16D-Murata-datasheet-12511495.pdf?src-supplier=TME, Item Type=Capacitor, Manufacturer Part Number=GCM1555C1H180GA16D, Mounting Technology="Surface Mount", Packaging="Cut Tape", Pricing="500=0.013, 5000=0.009 (GBP)", RoHS=Yes, RoHS Compliant=Yes, Series=GCM, Stock=10000, Supplier=Rs
C42 C43: library part CC0402JRNPO9BN300, "CAP CER 30PF 50V C0G/NPO 0402", Manufacturer=Yageo, Supplier Part Number 1=6784771, Temperature Coefficient=30ppm/°C, Category="Ceramic Capacitors", ComponentLink1Description=https://datasheet.ciiva.com/13263/upy-gp-np0-16v-to-50v-8-3714-13263961.pdf?src-supplier=Mouser, ComponentLink1URL=https://datasheet.ciiva.com/13263/upy-gp-np0-16v-to-50v-8-3714-13263961.pdf?src-supplier=Mouser, Halogen Free=5694HalogenFree, Item Type=Capacitor, Manufacturer Part Number=CC0402JRNPO9BN300, Pricing 1="10000=0.0025, 40000=0.0024, 150000=0.0023, 400000=0.0022, 1000000=0.0021 (USD)", RoHS=Yes, Stock 1=540000, Supplier 1="Future Electronics"
D1: "60V 700mV@1A 1A SMA(DO-214AC) Schottky Barrier Diodes (SBD) ROHS", LCSC Part Number=C2481, Manufacturer=MDD, Package=SMA(DO-214AC), ComponentLink1Description=LCSC, ComponentLink1URL=https://www.lcsc.com/product-detail/Schottky-Barrier-Diodes-SBD_MDD-Microdiode-Electronics-SS16_C2481.html, Item Type="Schottky Diode", Manufacturer Part Number=SS16
FB1: "FERRITE BEAD 120 OHM 0603 1LN", Case Code (Imperial)=0603, Case Code (Metric)=1608, Current Rating=3A, DC Resistance (DCR)=25mR, Frequency=100MHz, LCSC Part Number=C113030, Manufacturer=Murata, Max Operating Temperature=125°C, Min Operating Temperature=-55°C, Package Quantity=1, Tolerance=25%, Case/Package=0603, Category="Ferrite Beads and Chips", ComponentLink1Description=https://datasheet.ciiva.com/1012/l0110s0100blm18s-1012624.pdf?src-supplier=Digi-Key, ComponentLink1URL=https://datasheet.ciiva.com/1012/l0110s0100blm18s-1012624.pdf?src-supplier=Digi-Key, ComponentLink2Description=https://datasheet.ciiva.com/11799/0900766b811b5866-11799181.pdf?src-supplier=RSComponents, ComponentLink2URL=https://datasheet.ciiva.com/11799/0900766b811b5866-11799181.pdf?src-supplier=RSComponents, ComponentLink3Description=https://datasheet.ciiva.com/18093/getdatasheetpartid-295885-18093249.pdf?src-supplier=Verical, ComponentLink3URL=https://datasheet.ciiva.com/18093/getdatasheetpartid-295885-18093249.pdf?src-supplier=Verical, ComponentLink4Description=https://datasheet.ciiva.com/41449/001171723-da-01-en-chip-drossel0603-120r-3000ma-1-6x0-8mm-41449353.pdf?src-supplier=Conrad, ComponentLink4URL=https://datasheet.ciiva.com/41449/001171723-da-01-en-chip-drossel0603-120r-3000ma-1-6x0-8mm-41449353.pdf?src-supplier=Conrad, ComponentLink5Description=https://datasheet.ciiva.com/41449/001172312-da-01-en-drossel-0603-120r-1-6x0-8mm-10000st-41449675.pdf?src-supplier=Conrad, ComponentLink5URL=https://datasheet.ciiva.com/41449/001172312-da-01-en-drossel-0603-120r-1-6x0-8mm-10000st-41449675.pdf?src-supplier=Conrad, ComponentLink6Description=https://datasheet.ciiva.com/8021/5151-8021511.pdf?src-supplier=Element14, ComponentLink6URL=https://datasheet.ciiva.com/8021/5151-8021511.pdf?src-supplier=Element14, ComponentLink7Description=https://datasheet.ciiva.com/8021/5151-8021512.pdf?src-supplier=Element14, ComponentLink7URL=https://datasheet.ciiva.com/8021/5151-8021512.pdf?src-supplier=Element14, ComponentLink8Description=https://datasheet.ciiva.com/14122/blm-series-eng-tds-14122906.pdf?src-supplier=Distrelec, ComponentLink8URL=https://datasheet.ciiva.com/14122/blm-series-eng-tds-14122906.pdf?src-supplier=Distrelec, ComponentLink9Description=https://datasheet.ciiva.com/1012/l0110s0100blm18s-1012623.pdf?src-supplier=Digi-Key, ComponentLink9URL=https://datasheet.ciiva.com/1012/l0110s0100blm18s-1012623.pdf?src-supplier=Digi-Key, ComponentLink10Description=https://datasheet.ciiva.com/1012/l0110s0100blm18s-1012625.pdf?src-supplier=Digi-Key, ComponentLink10URL=https://datasheet.ciiva.com/1012/l0110s0100blm18s-1012625.pdf?src-supplier=Digi-Key, ComponentLink11Description=https://datasheet.ciiva.com/16395/l0110s0100blm18s-16395498.pdf?src-supplier=Future+Electronics, ComponentLink11URL=https://datasheet.ciiva.com/16395/l0110s0100blm18s-16395498.pdf?src-supplier=Future+Electronics, Core Material=Ferrite, DC Resistance-Max=25mR, Depth=0.8mm, Height=0.8mm, Impedance=120R, Item Type="Ferrite Bead", Lead Free="Lead Free", Length=1.6mm, Manufacturer Part Number=BLM18SG121TN1D, Material=Steel,Ferrite, Max Current Rating=3A, Max DC Current=3A, Number of Circuits=1, Number of Lines=1, Number of Pins=2, Packaging="Tape and Reel", Pricing 1="1=0.12640, 10=0.08350, 25=0.07210, 100=0.05150, 250=0.04730, 500=0.04110, 1000=0.03420, 3000=0.03360, 6000=0.03320, 15000=0.03270, 30000=0.03200, 75000=0.03150 (USD)", Reach SVHC Compliant=Yes, RoHS=Yes, RoHS Compliant=Yes, Series=BLM18S, Shielding=Unshielded, Stock 1=82612, Supplier 1="Arrow Electronics", Supplier Part Number 1=BLM18SG121TN1D, Termination=SMD/SMT, Test Frequency=100MHz, Width=0.8mm
J1: "DC Power Receptacle Jack 2.5A 2.5mm 6.5mm SMD Power Connectors RoHS", LCSC Part Number=C319133, Manufacturer="XKB Enterprise", Package=Custom, ComponentLink1Description=LCSC, ComponentLink1URL=https://www.lcsc.com/product-detail/AC-DC-Power-Connectors_XKB-Connectivity-DC-005-5A-2-5-SMT_C319133.html, Manufacturer Part Number=DC-005-5A-2.5-SMT
J2 J3 J5 J6 J8 J9 J11 J12 J13 J14 J15 J16: "CONN HEADER SMD R/A 4POS 2MM", LCSC Part Number=C265102, Manufacturer=JST, Supplier Part Number=7687031, ComponentLink1Description=https://datasheet.ciiva.com/11746/0900766b80df0d9d-11746552.pdf?src-supplier=Rs, ComponentLink1URL=https://datasheet.ciiva.com/11746/0900766b80df0d9d-11746552.pdf?src-supplier=Rs, ComponentLink2Description=https://datasheet.ciiva.com/712/eph-712578.pdf?src-supplier=Digikey, ComponentLink2URL=https://datasheet.ciiva.com/712/eph-712578.pdf?src-supplier=Digikey, ComponentLink3Description=https://datasheet.ciiva.com/712/eph-712579.pdf?src-supplier=Digikey, ComponentLink3URL=https://datasheet.ciiva.com/712/eph-712579.pdf?src-supplier=Digikey, ComponentLink4Description=https://datasheet.ciiva.com/730/eph-730675.pdf?src-supplier=Digikey, ComponentLink4URL=https://datasheet.ciiva.com/730/eph-730675.pdf?src-supplier=Digikey, ComponentLink5Description=https://datasheet.ciiva.com/8052/1699381-8052234.pdf?src-supplier=Element14, ComponentLink5URL=https://datasheet.ciiva.com/8052/1699381-8052234.pdf?src-supplier=Element14, Gender=29Gender, Item Type=Connectors, Manufacturer Part Number=S4B-PH-SM4-TB(LF)(SN), Pricing="1=0.935, 10=0.83, 40=0.77, 150=0.71, 500=0.655 (USD)", RoHS=Yes, Stock=78, Supplier="Future Electronics"
J4 J7: "Gold 250V 3A Straight Square Pins 2.5mm 3P 260℃ 6mm -40℃~+105℃ 3mm 2.54mm Plugin Black Brass 1x3P Plugin,P=2.54mm Pin Headers ROHS", LCSC Part Number=C706875, Manufacturer=XKB, Package=Plugin,P=2.54mm, ComponentLink1Description=LCSC, ComponentLink1URL=https://www.lcsc.com/product-detail/Pin-Headers_XKB-Connectivity-X6511WV-03H-C60D30_C706875.html, Item Type="Male Header", Manufacturer Part Number=X6511WV-03H-C60D30
J10: "CONN HEADER SMD 10POS 1.27MM", Color=Black, Contact Resistance=30mR, Current Rating=1A, Insulation Resistance=100MR, LCSC Part Number=C150517, Manufacturer="Amphenol FCI", Max Operating Temperature=85°C, Max Voltage Rating (AC)=125V, Min Operating Temperature=-40°C, Package Quantity=600, Supplier Part Number 1=609-3695-6-ND, ComponentLink1Description=https://www.verical.com/server-webapp/html/getDatasheet?partID=177140&src-supplier=Verical, ComponentLink1URL=https://www.verical.com/server-webapp/html/getDatasheet?partID=177140&src-supplier=Verical, ComponentLink2Description=http://portal.fciconnect.com/Comergent/fci/drawing/20021121.pdf?src-supplier=Avnet, ComponentLink2URL=http://portal.fciconnect.com/Comergent/fci/drawing/20021121.pdf?src-supplier=Avnet, ComponentLink3Description=https://cdn.amphenol-icc.com/media/wysiwyg/files/drawing/20021121.pdf?src-supplier=Digi-Key, ComponentLink3URL=https://cdn.amphenol-icc.com/media/wysiwyg/files/drawing/20021121.pdf?src-supplier=Digi-Key, ComponentLink4Description=http://portal.fciconnect.com/Comergent/fci/drawing/20021121.pdf?src-supplier=Avnet+Europe, ComponentLink4URL=http://portal.fciconnect.com/Comergent/fci/drawing/20021121.pdf?src-supplier=Avnet+Europe, ComponentLink5Description=https://media.digikey.com/pdf/Data%20Sheets/FCI%20PDFs/Minitek%20127_Catalog.pdf?src-supplier=Digi-Key, ComponentLink5URL=https://media.digikey.com/pdf/Data%20Sheets/FCI%20PDFs/Minitek%20127_Catalog.pdf?src-supplier=Digi-Key, ComponentLink6Description=http://portal.fciconnect.com/Comergent//fci/drawing/20021121.pdf?src-supplier=Mouser, ComponentLink6URL=http://portal.fciconnect.com/Comergent//fci/drawing/20021121.pdf?src-supplier=Mouser, Connector Type="Male Pin,Header", Contact Material="Copper Alloy,Copper,Gold", Contact Mating Length=0.12inch, Contact Plating=Gold, Depth=3.4mm, Gender=Male, Housing Color=Black, Housing Material=Thermoplastic, Item Type="Jtag Male Header", Length=6.35mm, Manufacturer Part Number=20021121-00010C4LF, Mount="Surface Mount", Number of Contacts=10, Number of Positions=10, Number of Rows=2, Orientation=Straight, Packaging="Tape and Reel", Pitch=1.27mm, Pricing 1="1=0.87, 10=0.761, 100=0.6563 (USD)", Radiation Hardening=No, REACH SVHC="No SVHC", Row Spacing=0.05inch, Stack Height=3mm, Stock 1=0, Supplier 1=Digi-Key, Termination=Solder, Voltage Rating=125V
L1: library part LVT303012-1R5M-N, "2.34A 1.5uH Shielded Power Inductors ±20% SMD Power Inductors ROHS", LCSC Part Number=C280560, Manufacturer="Chilisin Elec", Package=SMD, ComponentLink1Description=LCSC, ComponentLink1URL=https://www.lcsc.com/product-detail/Power-Inductors_Chilisin-Elec-LVT303012-1R5M-N_C280560.html, Item Type=Inductor, Manufacturer Part Number=LVT303012-1R5M-N
L2: library part MLW2012RF-470MT, "280mA 47uH ±20% 3.4Ω 0805 Inductors (SMD) ROHS", LCSC Part Number=C2844637, Manufacturer=MetalLions, Package=0805, ComponentLink1Description=LCSC, ComponentLink1URL=https://www.lcsc.com/product-detail/Inductors-SMD_MetalLions-MLW2012RF-470MT_C2844637.html, Item Type=Inductor, Manufacturer Part Number=MLW2012RF-470MT
LED1: library part NCD0603R3, "RED LED 0603 Light Emitting Diodes", LCSC Part Number=C3151730, Manufacturer="Foshan NationStar Optoelectronics", Package=0603, ComponentLink1Description=LCSC, ComponentLink1URL=https://www.lcsc.com/product-detail/Light-Emitting-Diodes-LED_Foshan-NationStar-Optoelectronics-NCD0603R3_C3151730.html, Item Type=LED, Manufacturer Part Number=NCD0603R3
Q1 Q2 Q3 Q4 Q5 Q6 Q7 Q8 Q9 Q10 Q11 Q12: "TRANS PREBIAS NPN 50V SOT23-3", Manufacturer="Diodes Zetex", Supplier Part Number=DDTD113ZC-7FDICT-ND, ComponentLink1Description=https://datasheet.ciiva.com/15139/getdatasheetpartid-323116-15139824.pdf?src-supplier=Verical, ComponentLink1URL=https://datasheet.ciiva.com/15139/getdatasheetpartid-323116-15139824.pdf?src-supplier=Verical, Item Type=BJTs, Manufacturer Part Number=DDTD113ZC-7-F, Pricing="1=0.31, 10=0.21, 100=0.1027, 500=0.08562, 1000=0.05949 (USD)", RoHS=Yes, Stock=793860, Supplier=Digikey